# EAGLE board control (EAGLE 9.6.2), part 1 of 2
VERSION: v3.4
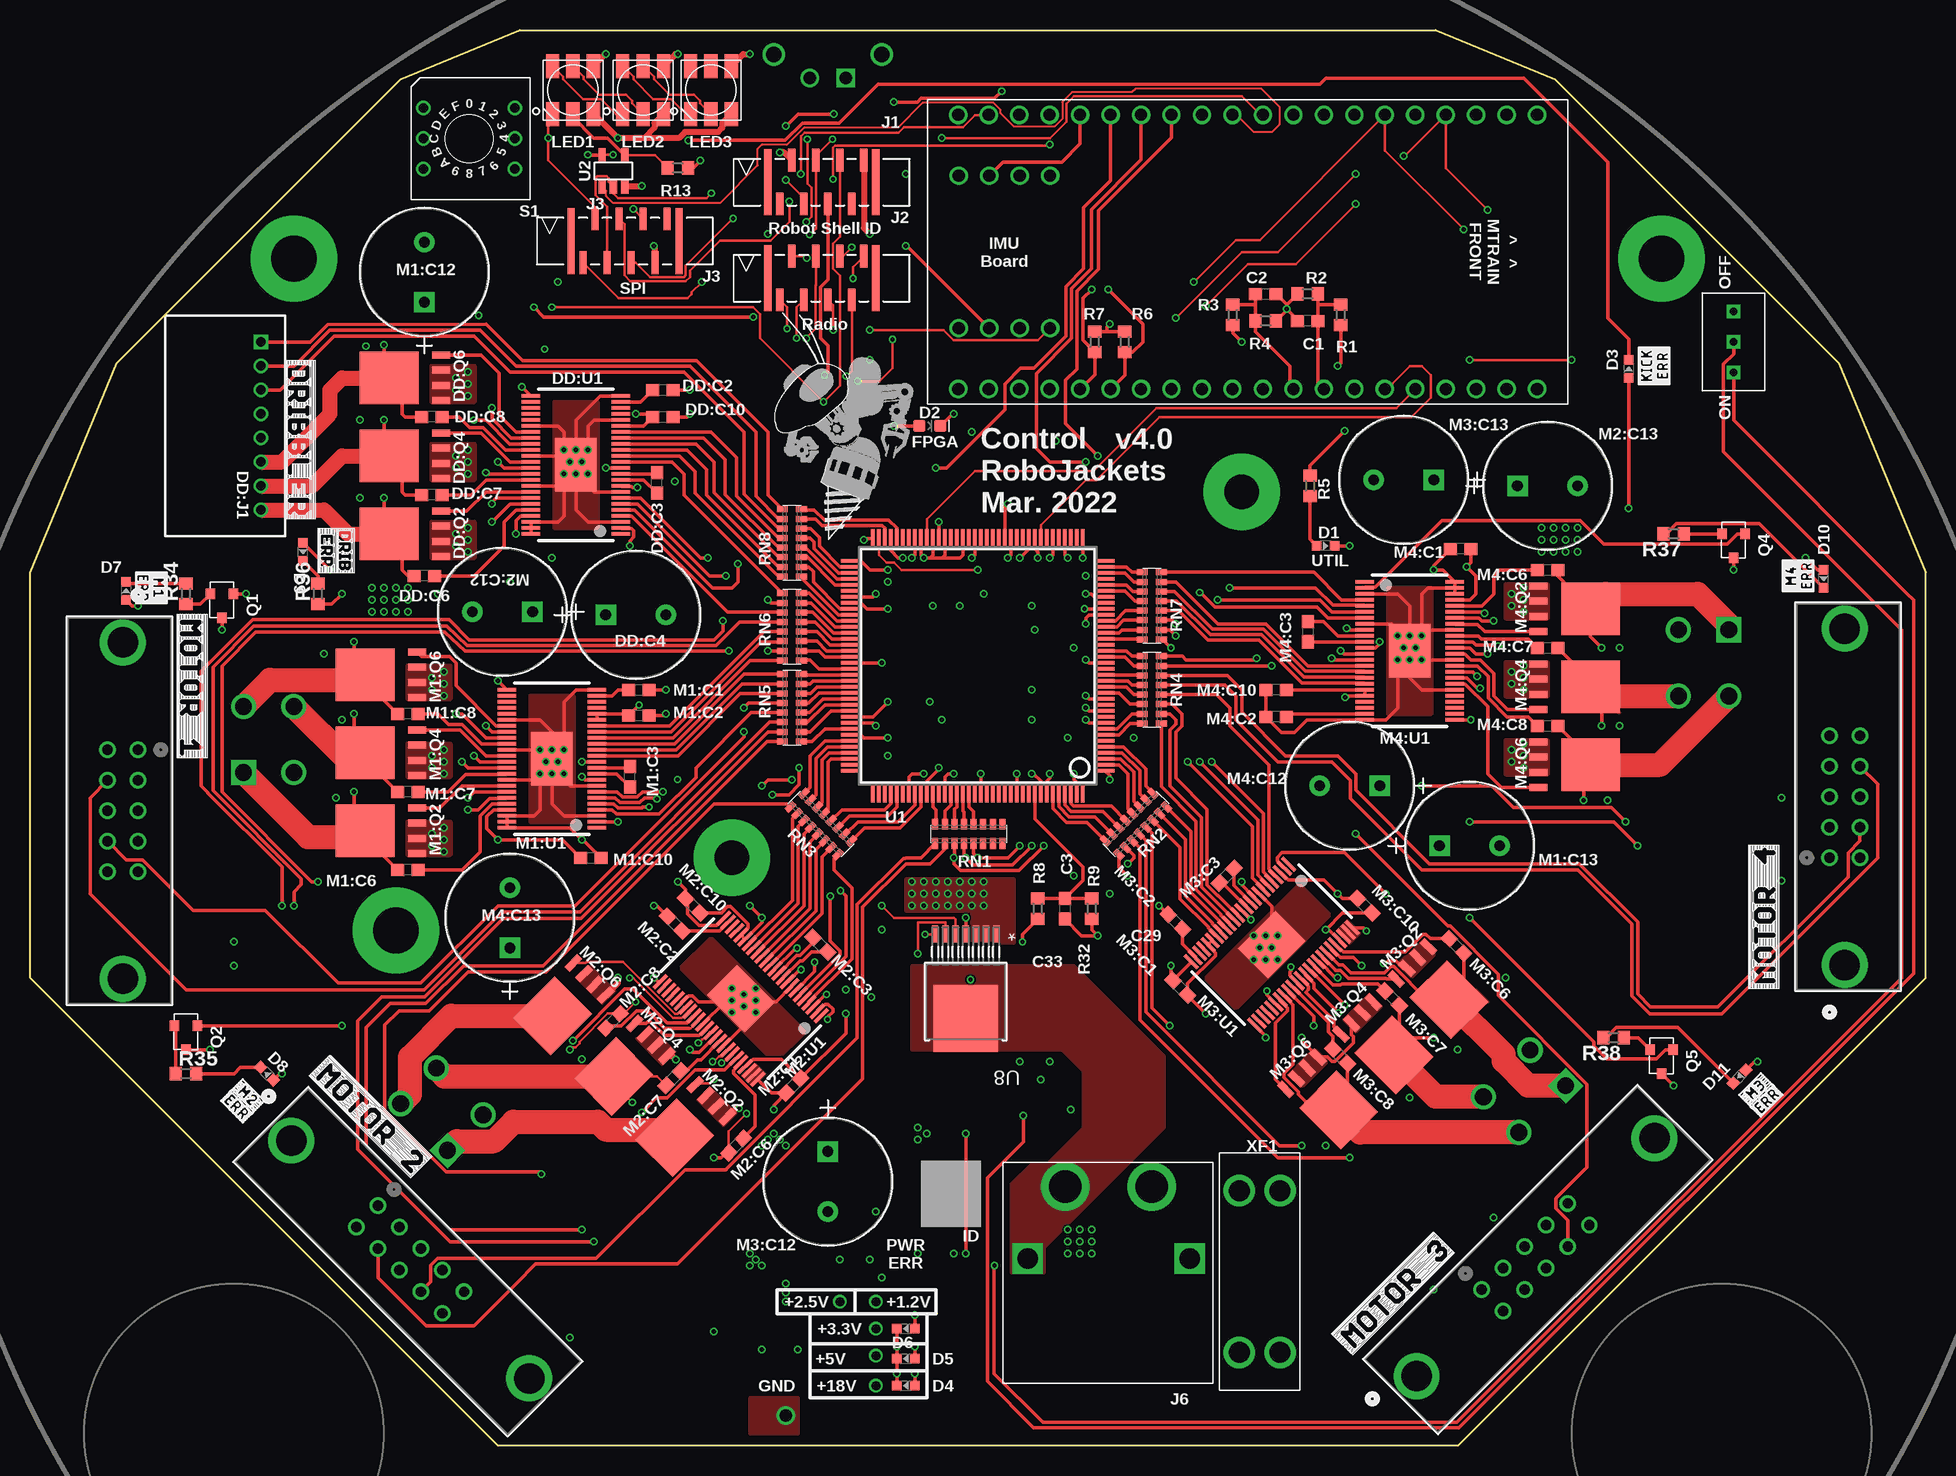
[diagram p0: board, top side]
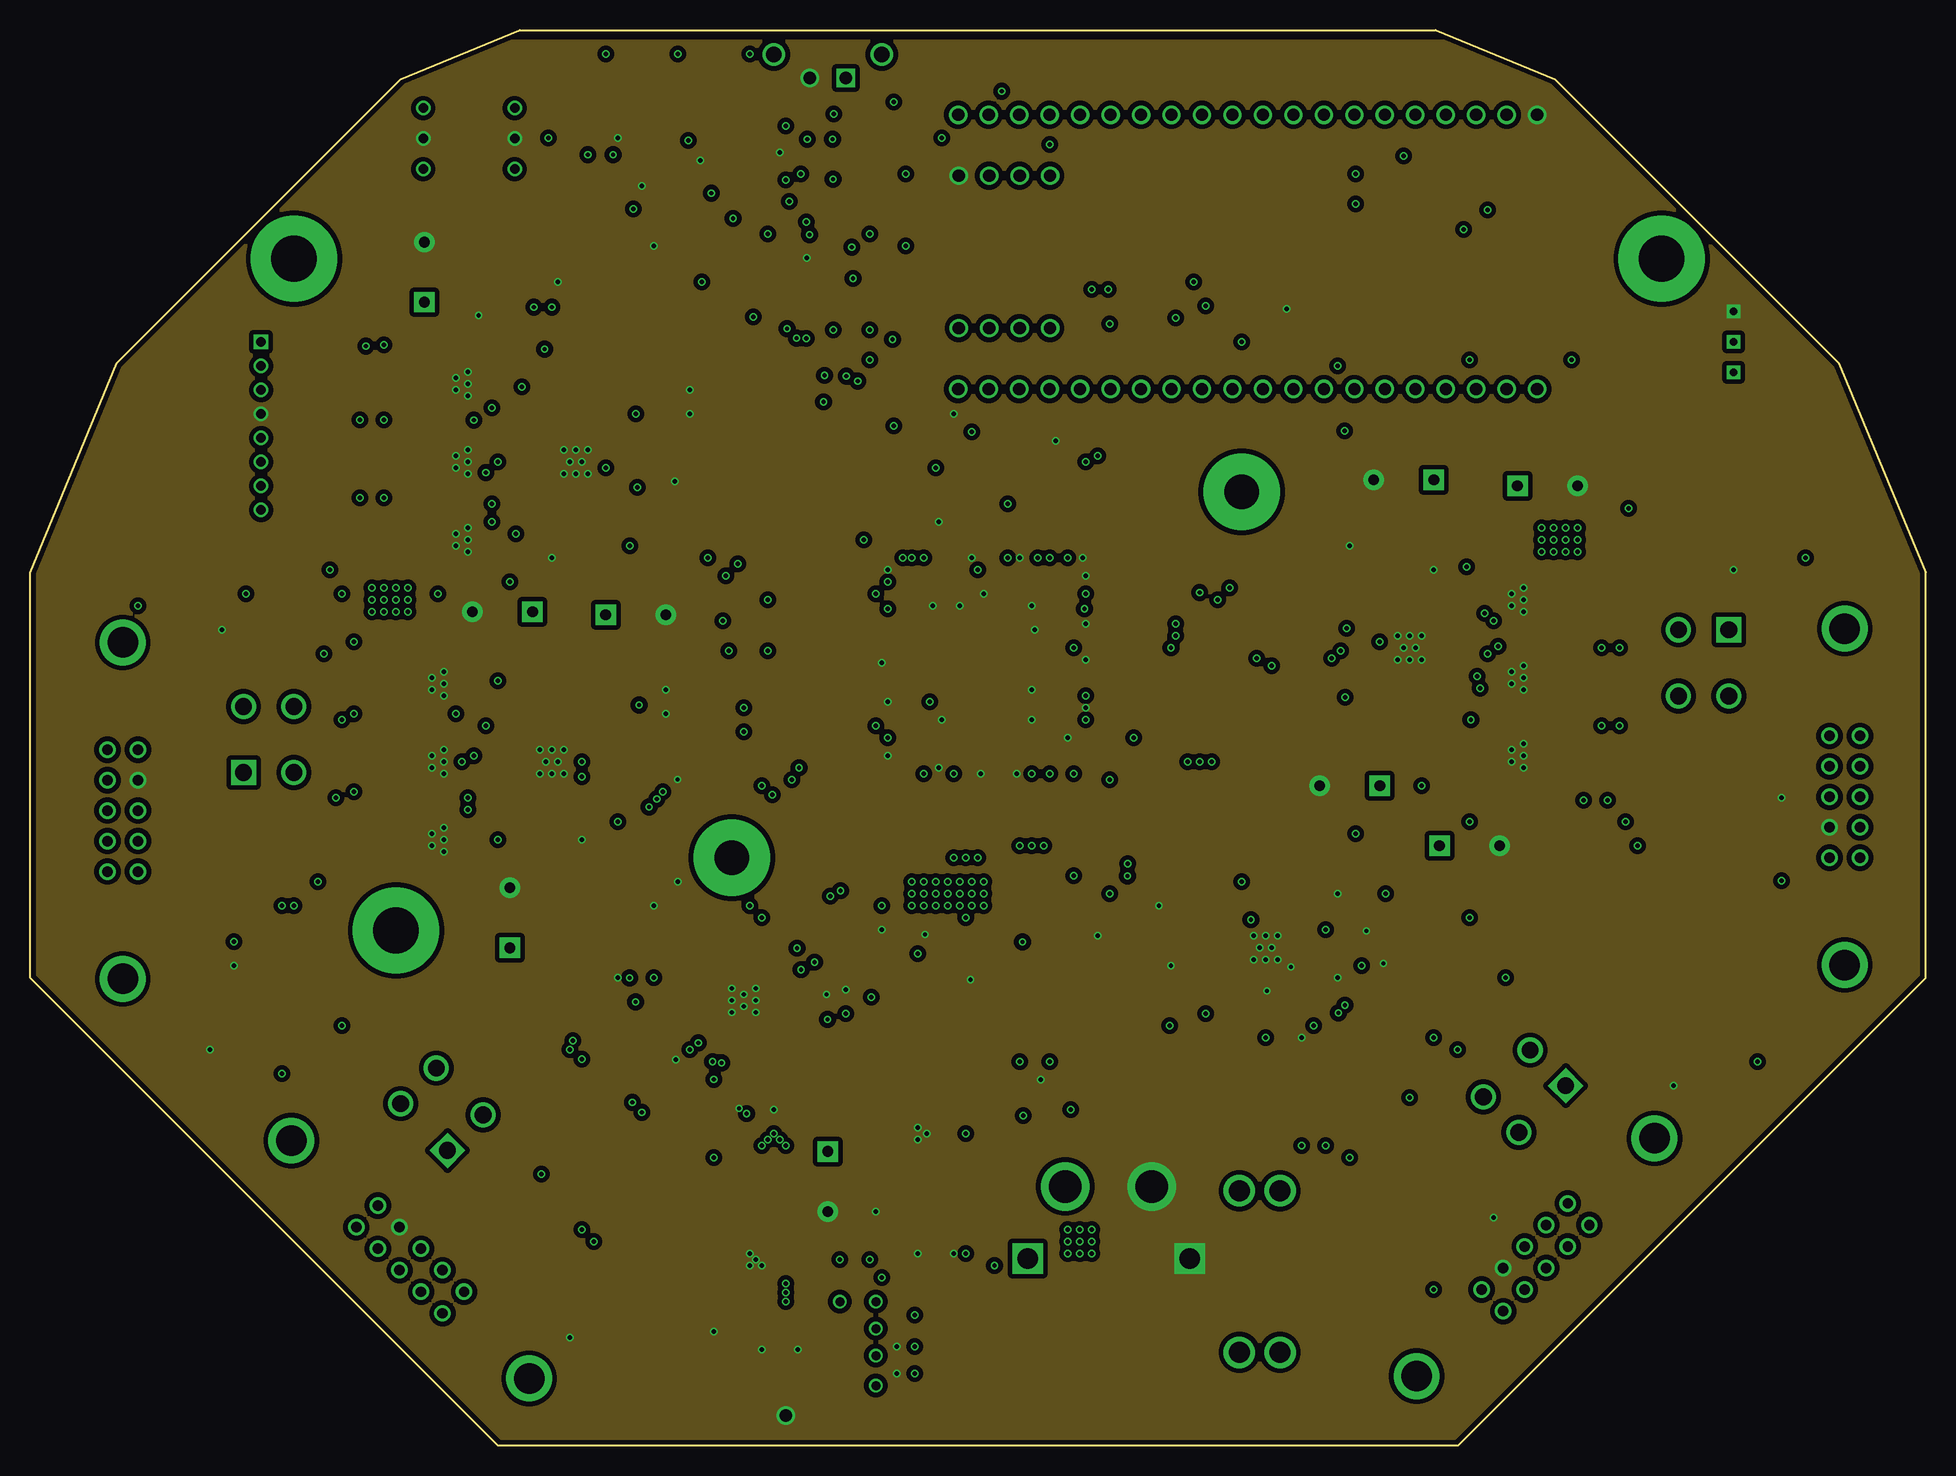
[diagram p1: board, inner layer GND]
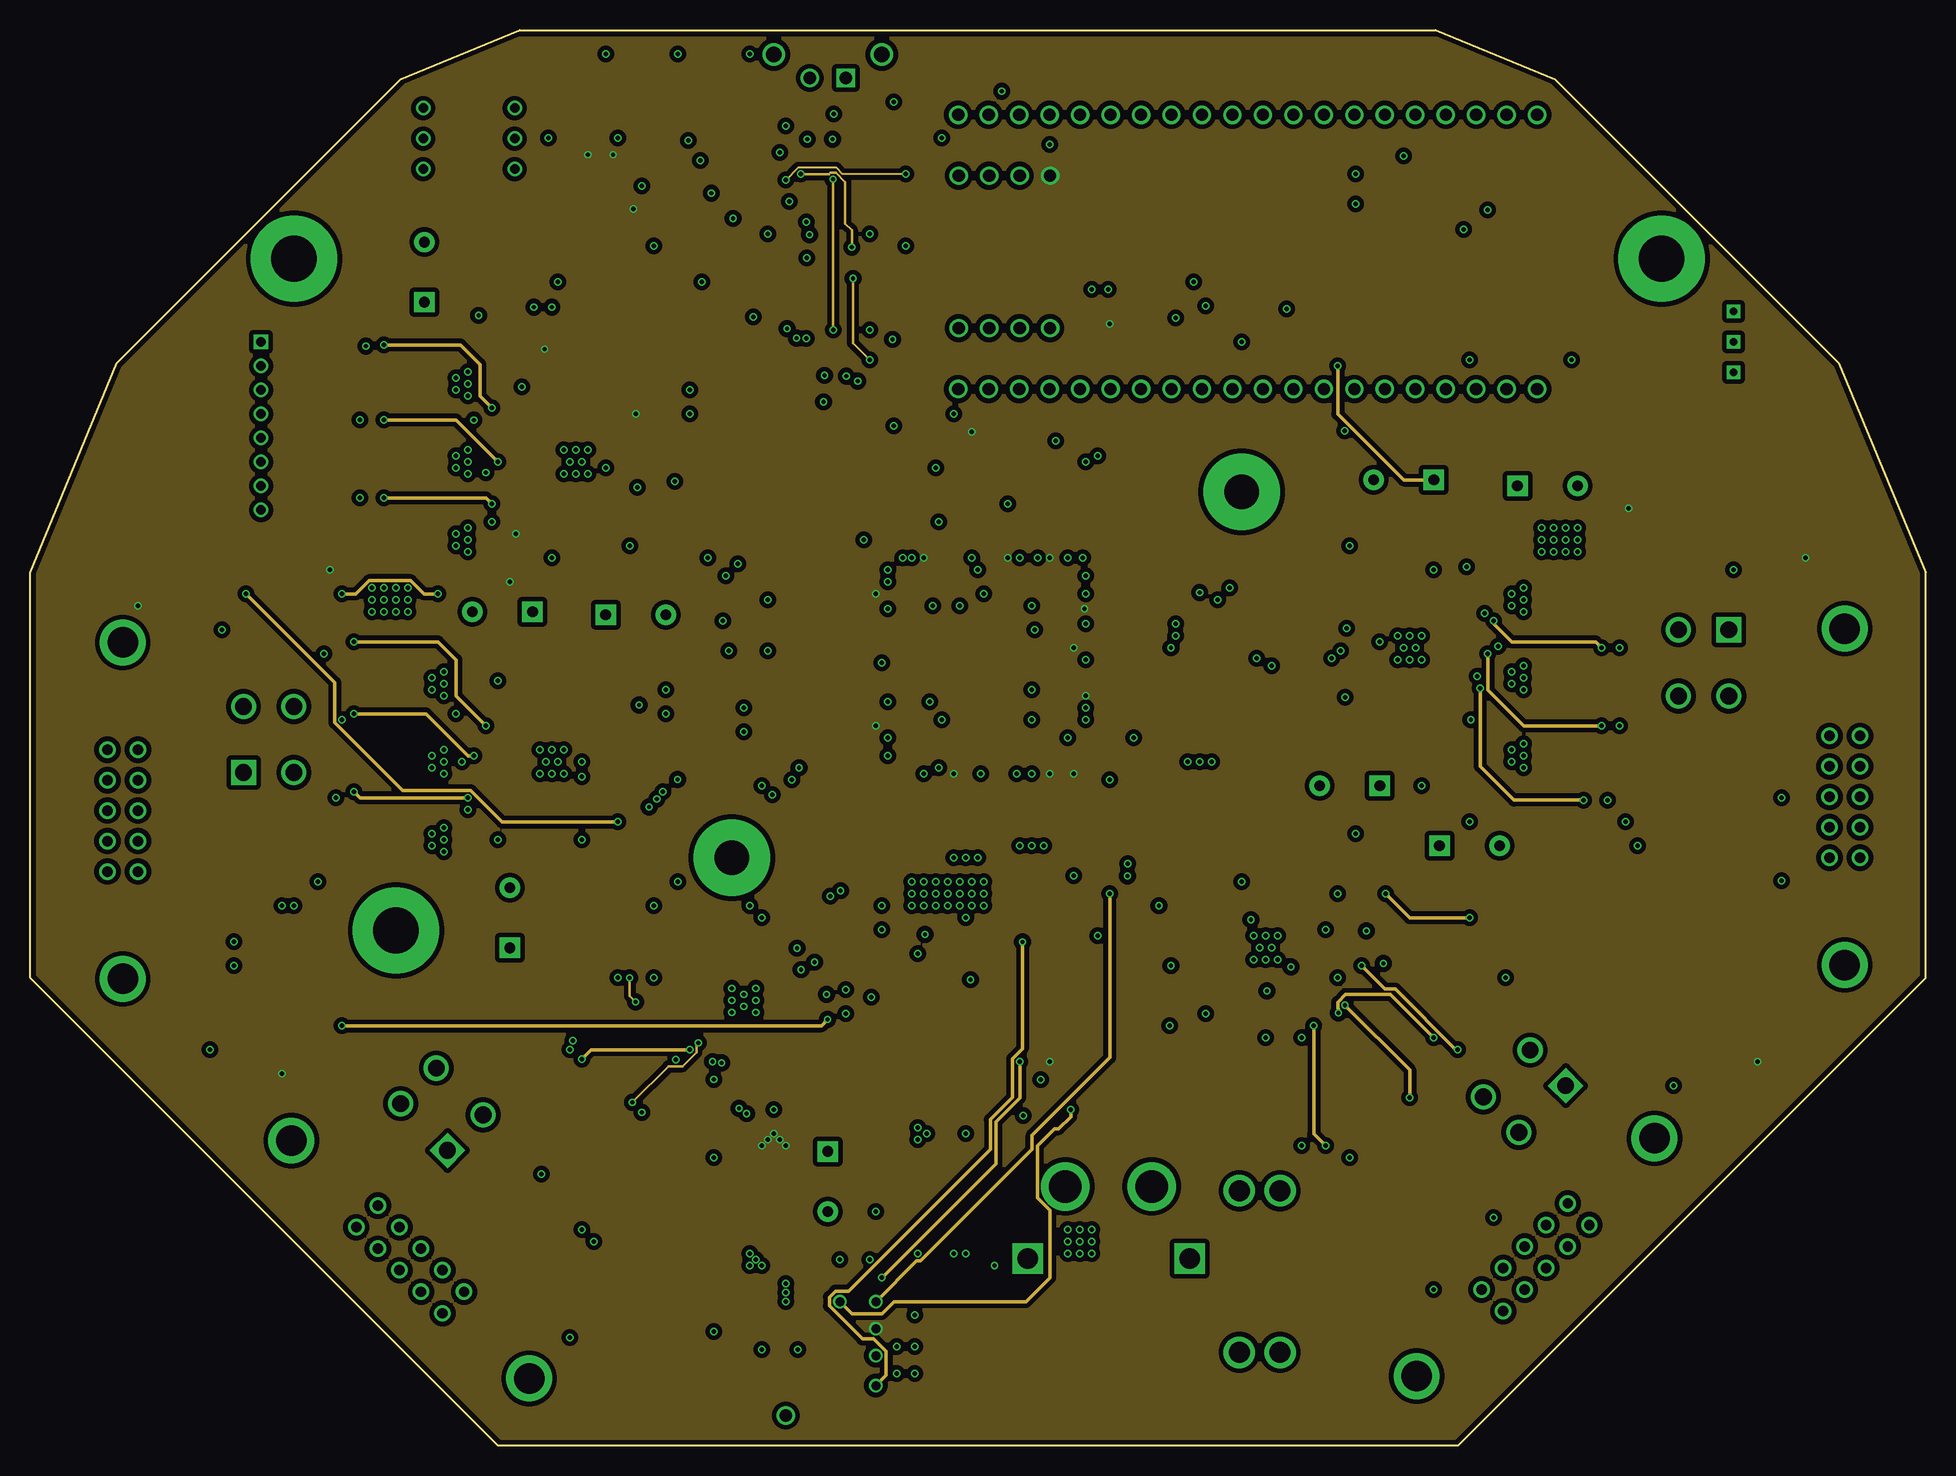
[diagram p2: board, inner layer 3v3]
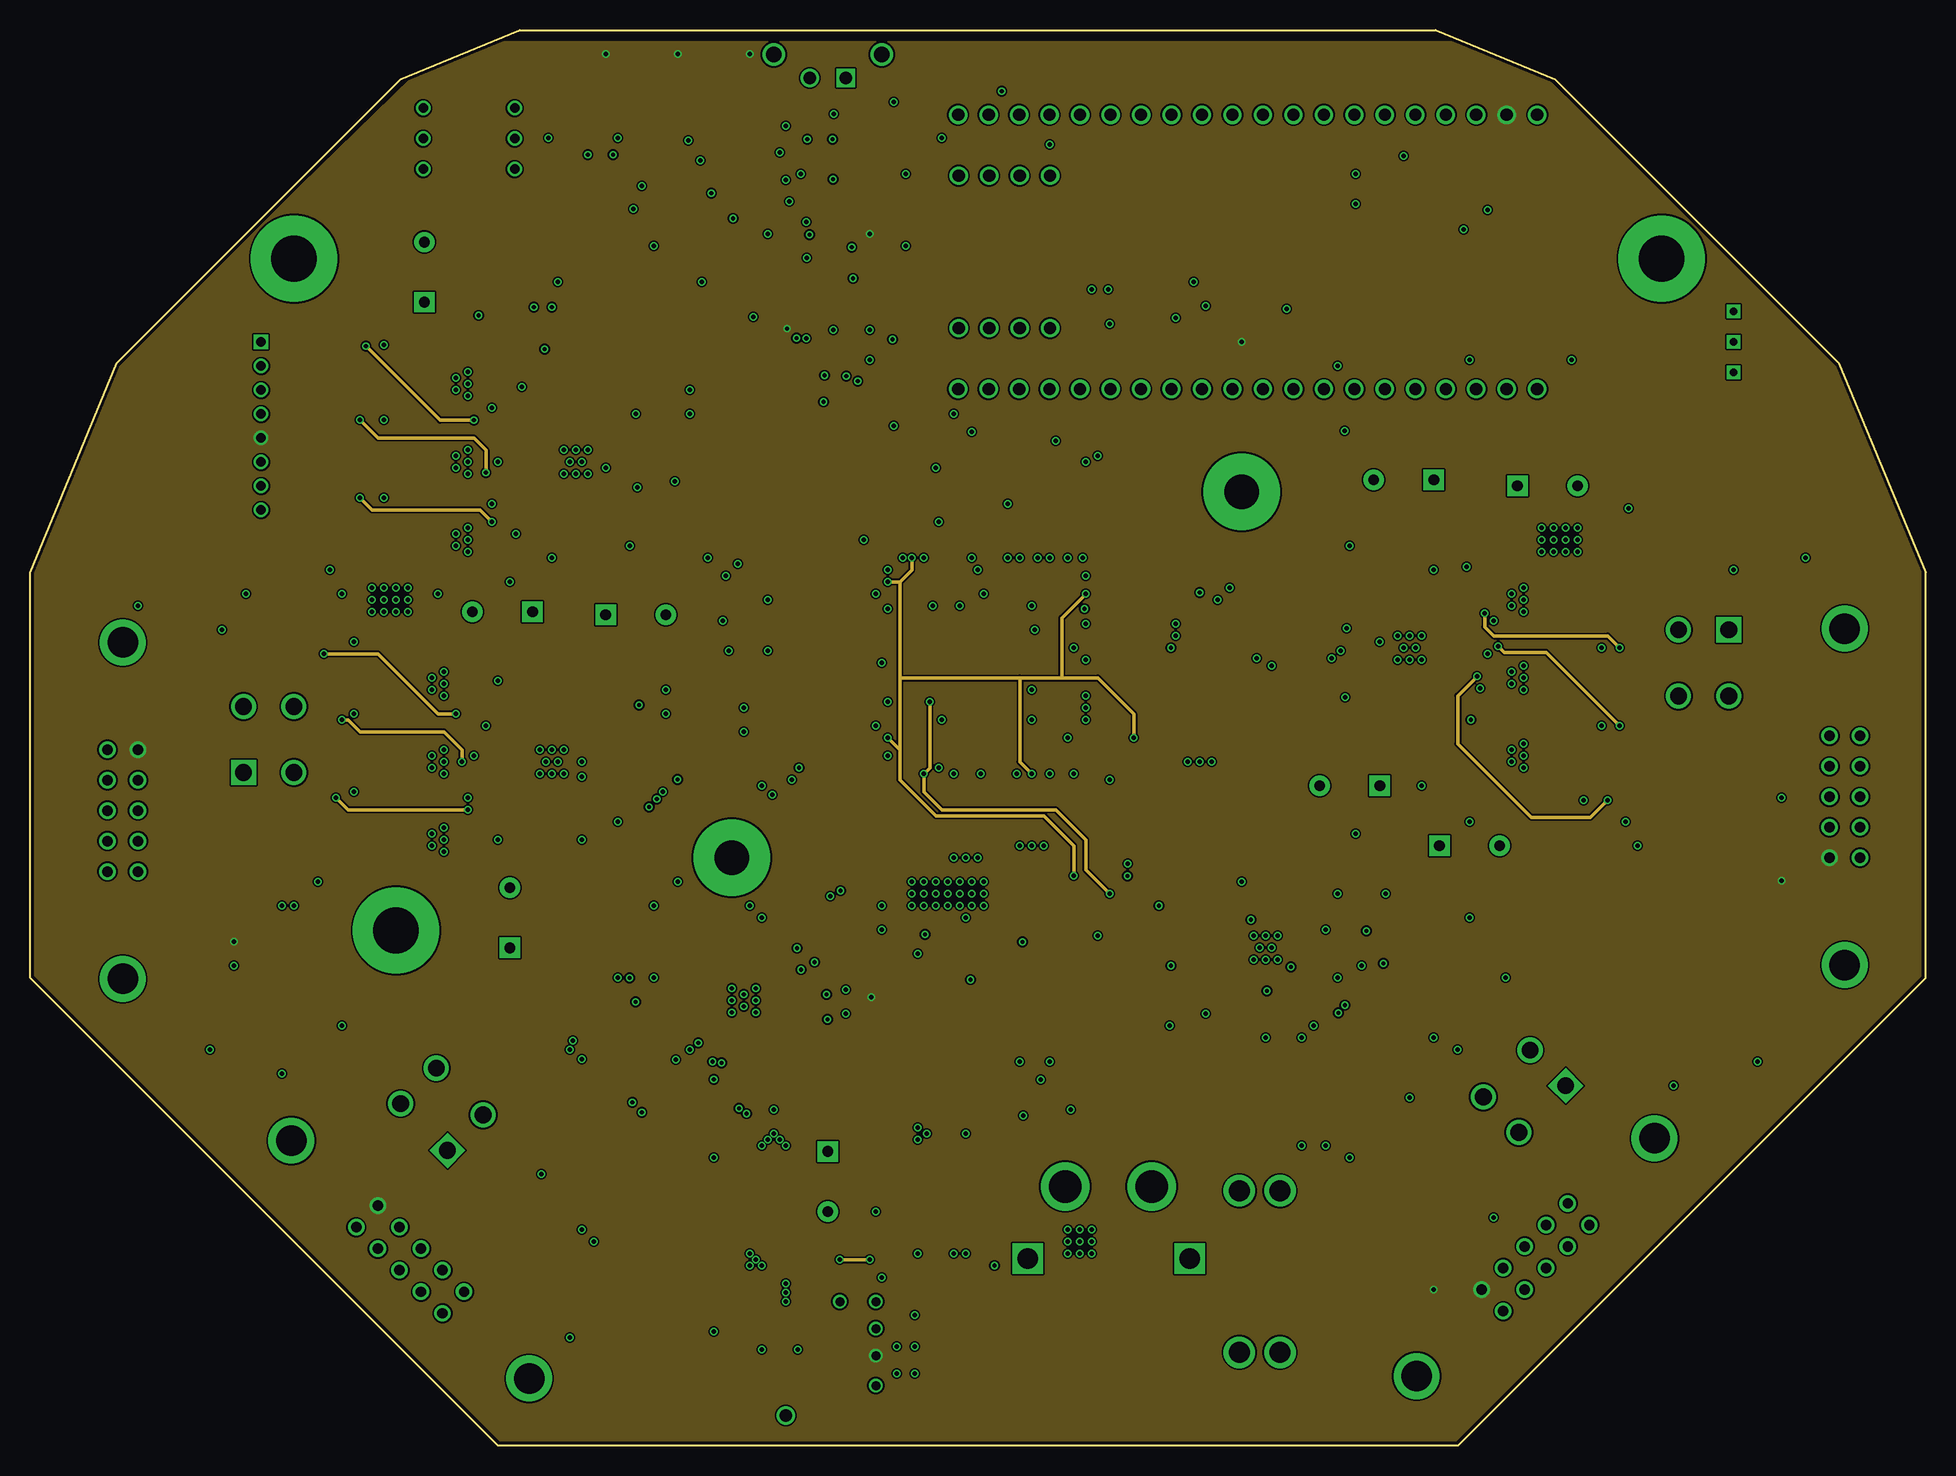
[diagram p3: board, inner layer 5v]
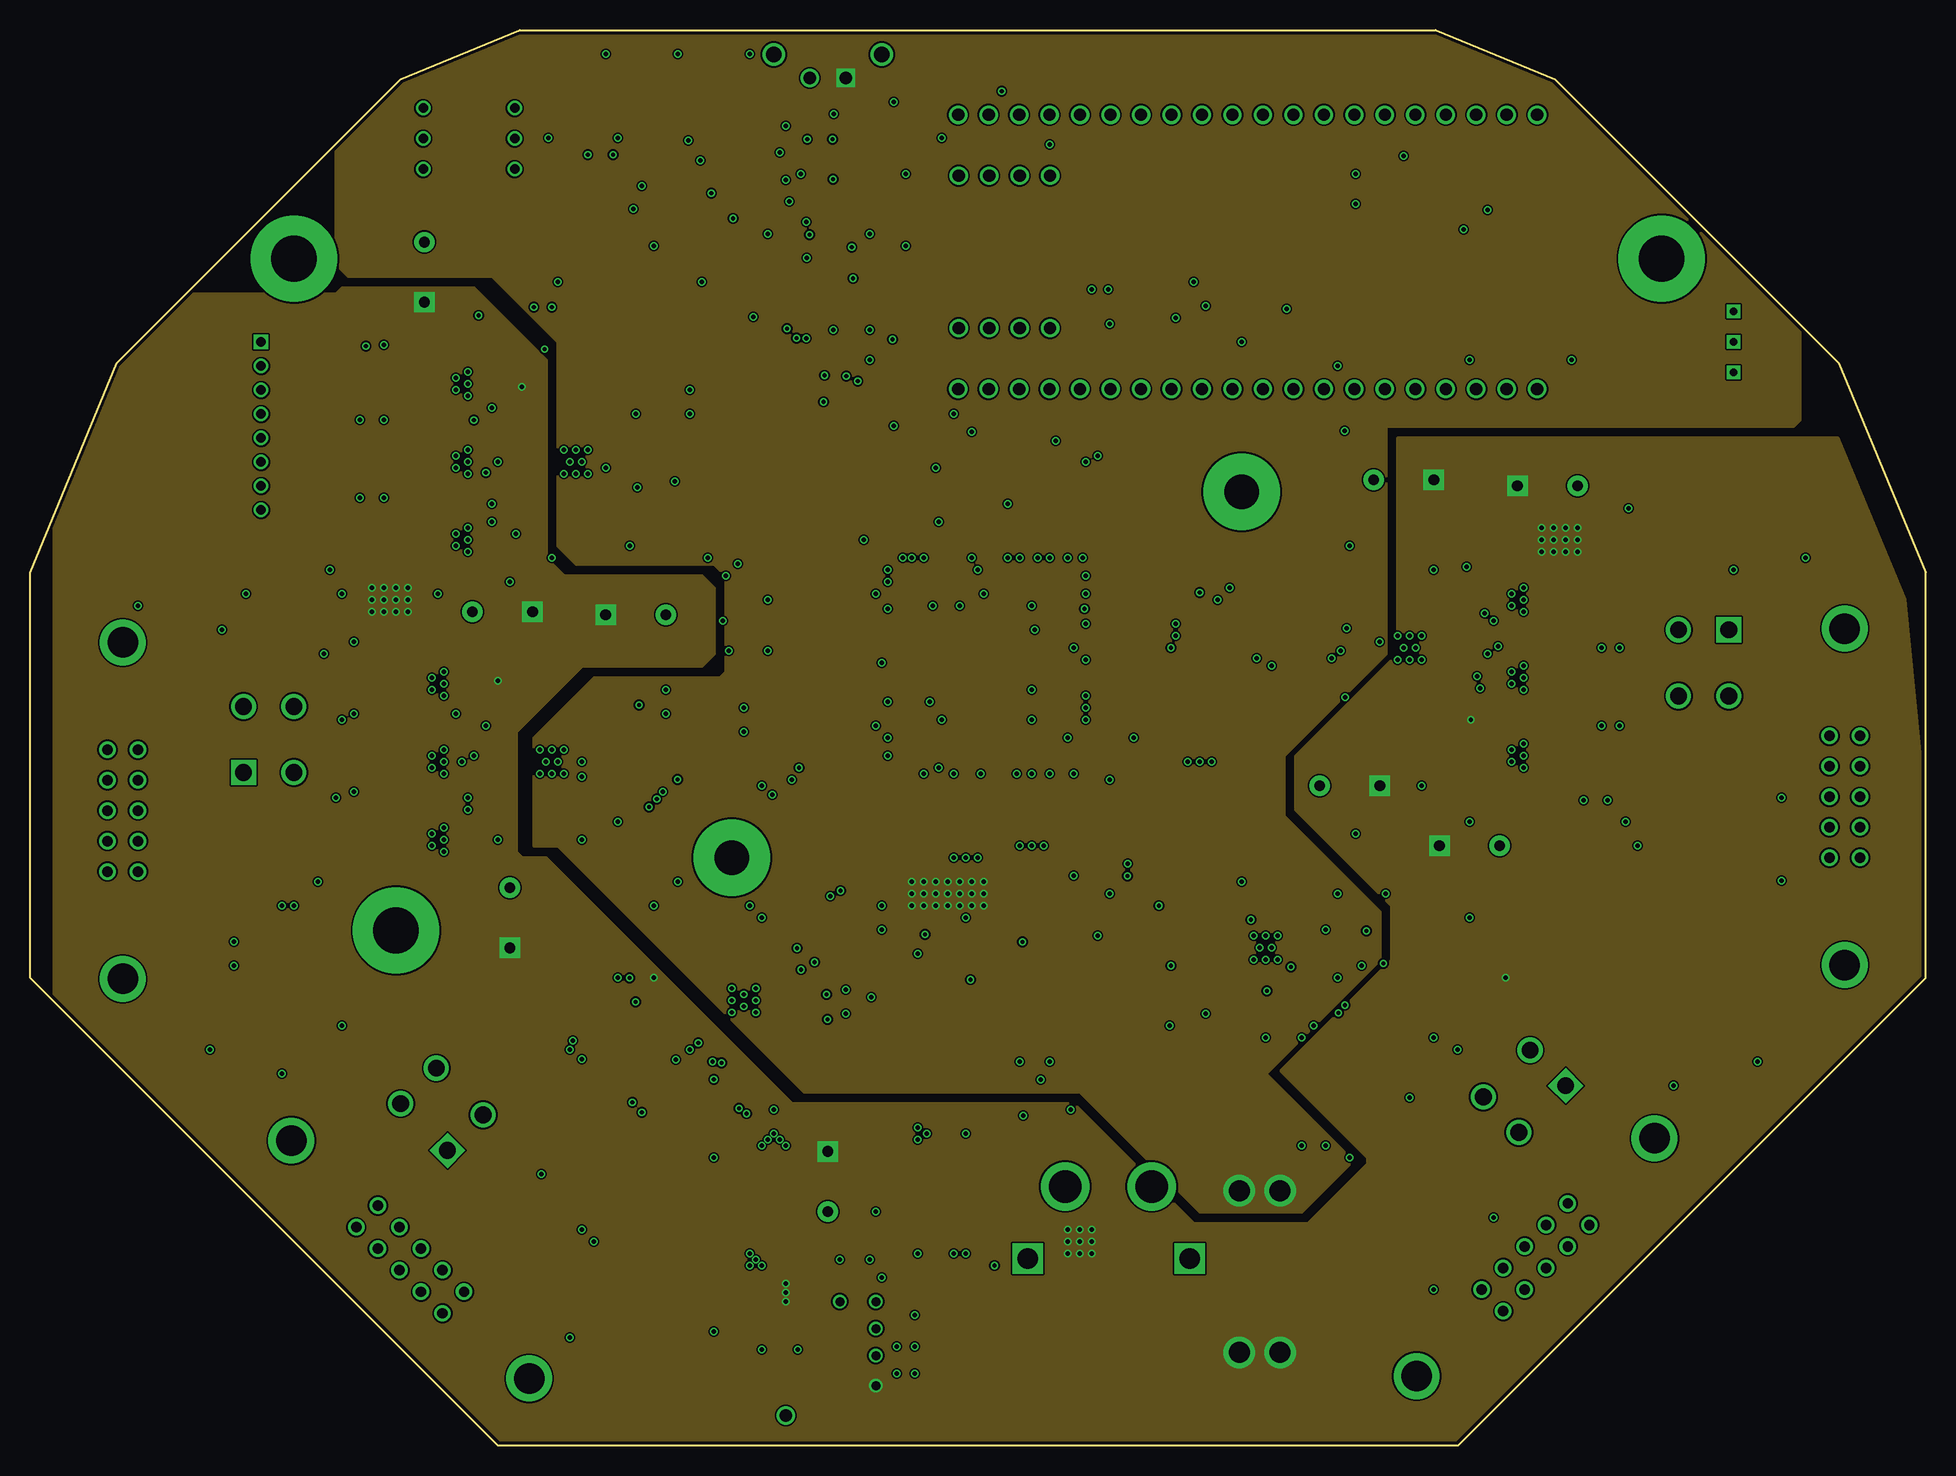
[diagram p4: board, inner layer Vbatt]
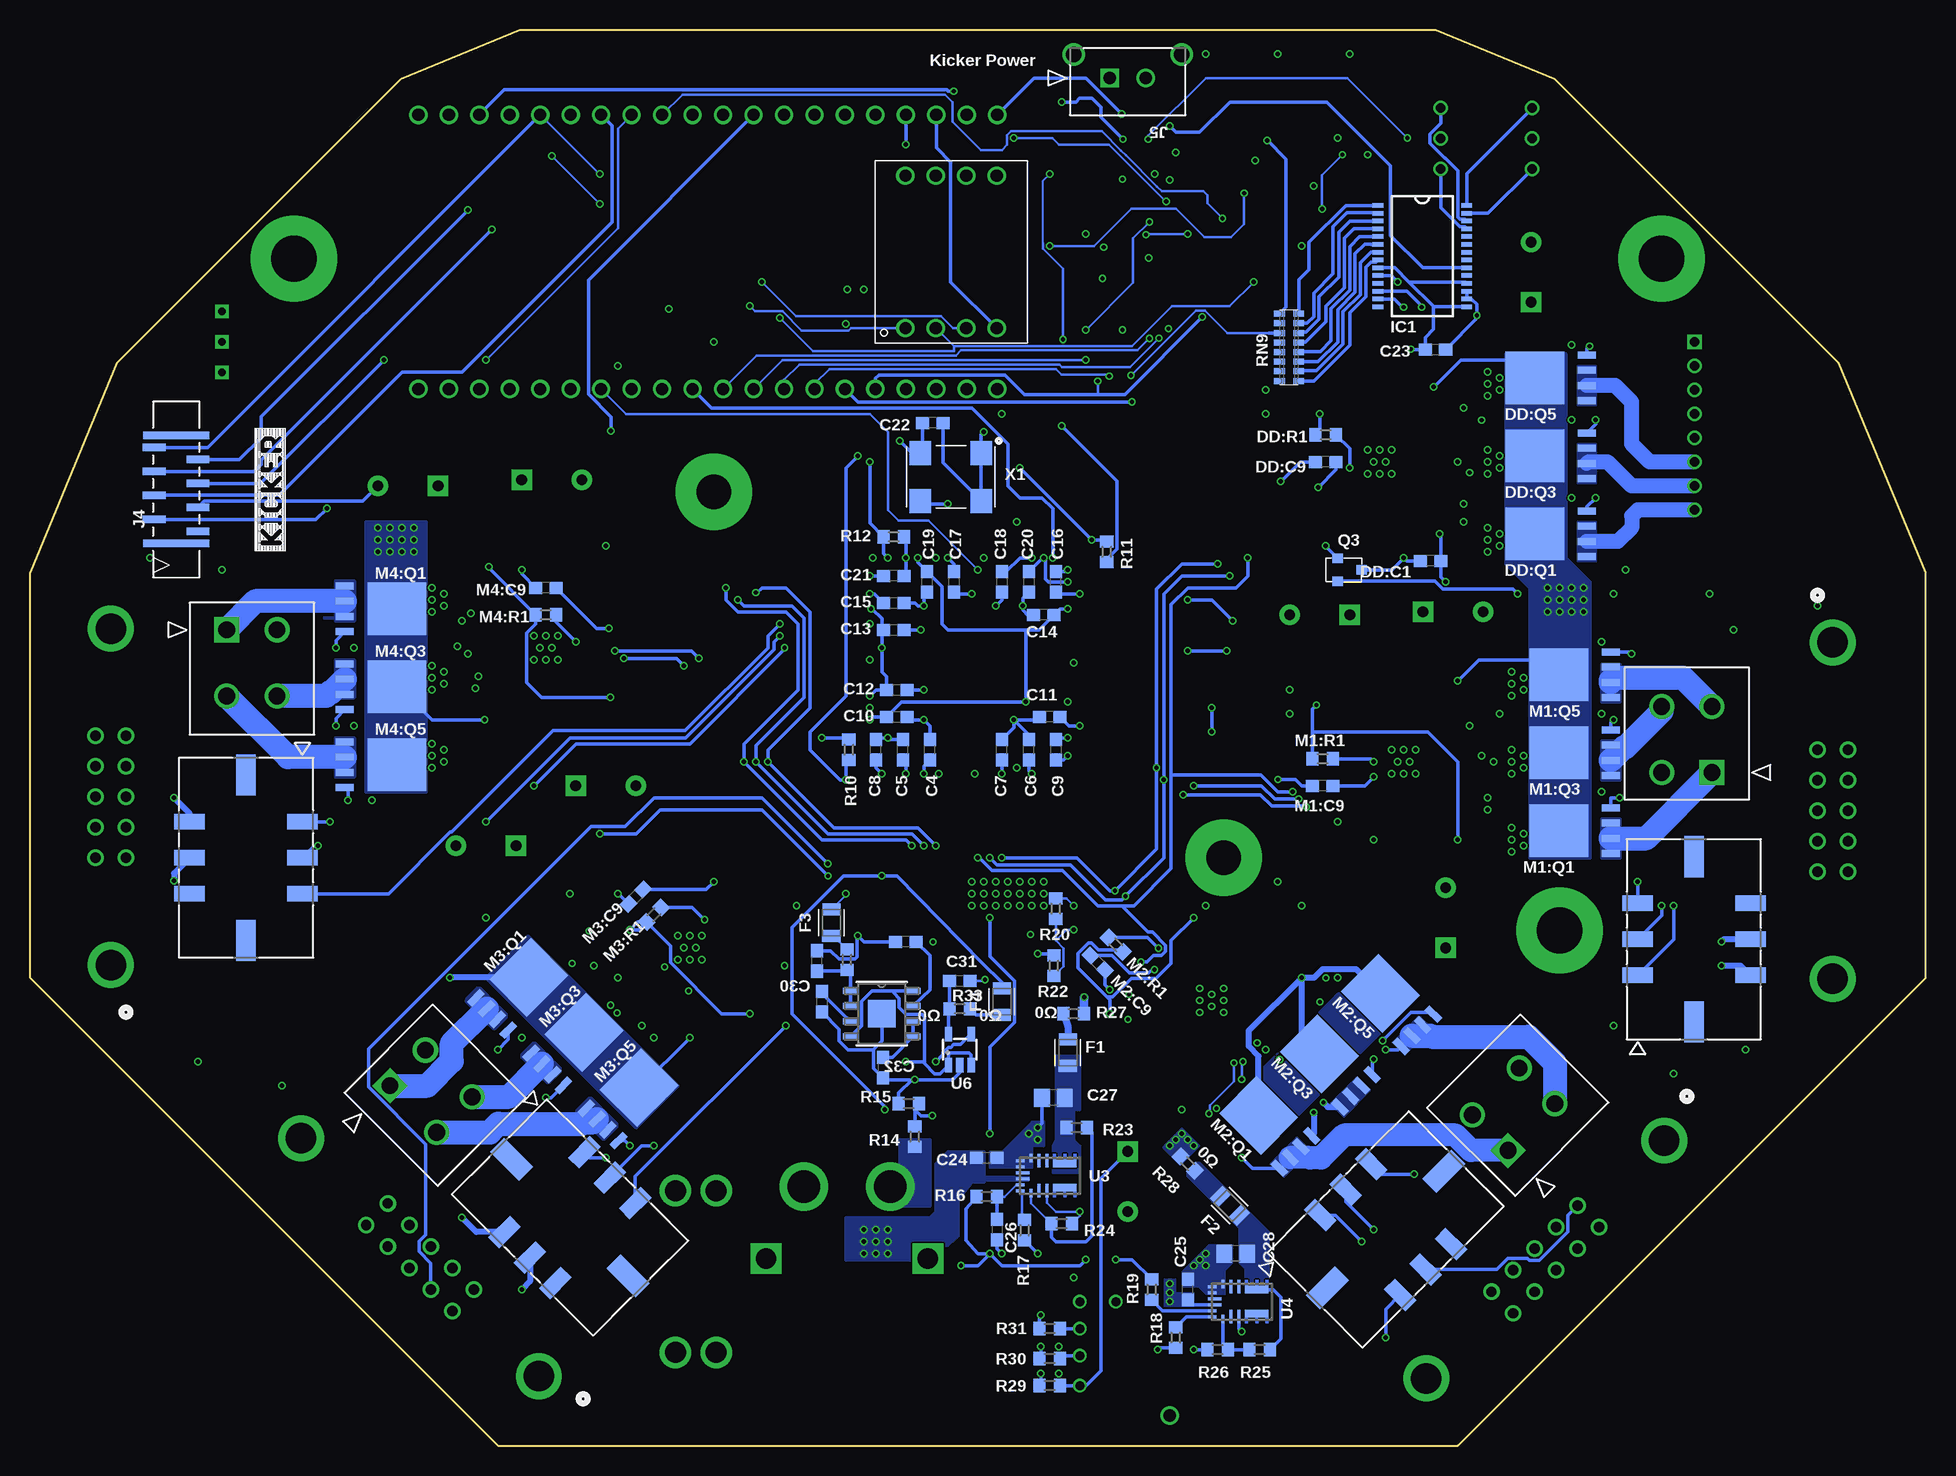
[diagram p5: board, bottom side, seen from below]

Size 158 x 118 mm. Coordinates in mm from the lower left corner, seen from the top.
Outline: 7.24,90.24 30.88,113.88 40.83,118 117.17,118 127.12,113.88 150.76,90.24 158,72.76 158,39 119,0 39,0 0,39 0,72.76 7.24,90.24
Copper layers (1+2*3+14*15+16): Top 0.018mm / dielectric 0.2mm / GND 0.035mm / dielectric 0.36mm / 3v3 0.035mm / dielectric 0.3mm / 5v 0.035mm / dielectric 0.15mm / Vbatt 0.035mm / dielectric 0.2mm / Bottom 0.018mm
Design rules "eC_6Layer_PClass6_BaseCopperO18-I35_eCDefault *": minimum track width 0.15mm, minimum drill 0.35mm, track to track 0.15mm, track to pad 0.15mm, pad to pad 0.15mm, via to via 0.15mm, smd to smd 0mil, copper to edge 0.25mm, drill to drill 0.35mm, minimum pad ring 0.175mm, minimum via ring 0.125mm, stop-mask expansion 0mil, vias tented up to drill 0.45mm, thermal gap 0.2mm

## Footprints (pad centres in the part's own frame; a part is rotated, then mirrored left to right if it is on the bottom)
C0603 = smd 1.1 x 1: 1 -0.85,0; 2 0.85,0
C0805 = smd 1.3 x 1.5: 1 -0.95,0; 2 0.95,0
CHIP-LED0603 = smd 0.8 x 0.8: A 0,-0.75; C 0,0.75
LED-0603 = smd 1 x 1: A -0.877,0; C 0.877,0
CAP_PAN_10X12.5 = drill 0.914 pad 1.676 square: 1 -5.004,0 | drill 0.914 pad 1.676: 2 0,0
2MM-8-H = drill 0.8 square: 1 -7,0 | drill 0.8: 2 -5,0; 3 -3,0; 4 -1,0; 5 1,0; 6 3,0; 7 5,0; 8 7,0
PQFN_5X6_E = smd 1.5 x 0.6: 1 -3.02,1.905; 2 -3.02,0.635; 3 -3.02,-0.635; 4 -3.02,-1.905 | smd 4.895 x 4.41: 5678 1.323,0
R0603 = smd 1 x 1.1: 1 -0.85,0; 2 0.85,0
TSSOP-48_PAD = smd 0.3 x 1.55: 1 -5.75,-3.75; 2 -5.25,-3.75; 3 -4.75,-3.75; 4 -4.25,-3.75; 5 -3.75,-3.75; 6 -3.25,-3.75; 7 -2.75,-3.75; 8 -2.25,-3.75; 9 -1.75,-3.75; 10 -1.25,-3.75; 11 -0.75,-3.75; 12 -0.25,-3.75; 13 0.25,-3.75; 14 0.75,-3.75; 15 1.25,-3.75; 16 1.75,-3.75; 17 2.25,-3.75; 18 2.75,-3.75; 19 3.25,-3.75; 20 3.75,-3.75; 21 4.25,-3.75; 22 4.75,-3.75; 23 5.25,-3.75; 24 5.75,-3.75; 25 5.75,3.75; 26 5.25,3.75; 27 4.75,3.75; 28 4.25,3.75; 29 3.75,3.75; 30 3.25,3.75; 31 2.75,3.75; 32 2.25,3.75; 33 1.75,3.75; 34 1.25,3.75; 35 0.75,3.75; 36 0.25,3.75; 37 -0.25,3.75; 38 -0.75,3.75; 39 -1.25,3.75; 40 -1.75,3.75; 41 -2.25,3.75; 42 -2.75,3.75; 43 -3.25,3.75; 44 -3.75,3.75; 45 -4.25,3.75; 46 -4.75,3.75; 47 -5.25,3.75; 48 -5.75,3.75 | smd 4.42 x 3.483: PAD 0,0
FUSC2113X75 = smd 1 x 1.52: 1 -1.1,0 | smd 1 x 1.5: 2 1.1,0
SSOP-28 = smd 0.9 x 0.38: 1 -3.7,4.225; 2 -3.7,3.575; 3 -3.7,2.925; 4 -3.7,2.275; 5 -3.7,1.625; 6 -3.7,0.975; 7 -3.7,0.325; 8 -3.7,-0.325; 9 -3.7,-0.975; 10 -3.7,-1.625; 11 -3.7,-2.275; 12 -3.7,-2.925; 13 -3.7,-3.575; 14 -3.7,-4.225; 15 3.7,-4.225; 16 3.7,-3.575; 17 3.7,-2.925; 18 3.7,-2.275; 19 3.7,-1.625; 20 3.7,-0.975; 21 3.7,-0.325; 22 3.7,0.325; 23 3.7,0.975; 24 3.7,1.625; 25 3.7,2.275; 26 3.7,2.925; 27 3.7,3.575; 28 3.7,4.225
CON8_1X8_UB_SFW_JAE = smd 0.61 x 1.905: 1 0,0; 2 1,3.65; 3 2,0; 4 3,3.65; 5 4,0; 6 5,3.65; 7 6,0; 8 7,3.65 | smd 0.61 x 5.512: NC1 -1,1.803; NC2 8,1.803
CON_436500217_MOL = drill 1.016 pad 1.524 square: 1 0,0 | drill 1.016 pad 1.524: 2 -2.997,0 | drill 1.27 pad 1.27: M1 2.997,-1.956; M2 -5.994,-1.956
XT60PW-M = drill 2.7: P$1 -3.6,0; P$2 3.6,0 | drill 1.7 square: P$3 -6.75,6; P$4 6.75,6
MTRAIN-KIT = drill 1.02: !RST 11.43,16.51; GND -11.43,24.13; NC 11.43,19.05; P$3 -11.43,19.05; P$4 -11.43,16.51; P$5 -11.43,13.97; P$6 -11.43,11.43; P$7 -11.43,8.89; P$8 -11.43,6.35; P$9 -11.43,3.81; P$10 -11.43,1.27; P$11 -11.43,-1.27; P$12 -11.43,-3.81; P$13 -11.43,-6.35; P$14 -11.43,-8.89; P$15 -11.43,-11.43; P$16 -11.43,-13.97; P$17 -11.43,-16.51; P$18 -11.43,-19.05; P$19 -11.43,-21.59; P$20 -11.43,-24.13; P$25 11.43,-13.97; P$26 11.43,-11.43; P$27 11.43,-8.89; P$28 11.43,-6.35; P$29 11.43,-3.81; P$30 11.43,-1.27; P$31 11.43,1.27; P$32 11.43,3.81; P$33 11.43,6.35; P$34 11.43,8.89; P$35 11.43,11.43; P$36 11.43,13.97; RX+ 11.43,-16.51; RX- 11.43,-19.05; TX+ 11.43,-21.59; TX- 11.43,-24.13; VBUS 11.43,21.59; VDD 11.43,24.13; VIN -11.43,21.59
IMU = drill 1.016: 1 -6.35,3.81; 2 -6.35,1.27; 3 -6.35,-1.27; 4 -6.35,-3.81; 5 6.35,-3.81; 6 6.35,-1.27; 7 6.35,1.27; 8 6.35,3.81
APA102_5050 = smd 2 x 1.1: 1 2,-1.7; 2 2,0; 3 2,1.7; 4 -2,1.7; 5 -2,0; 6 -2,-1.7
CON_430450618_MOL = smd 1.27 x 2.54: 1 3,-4.7; 2 0,-4.7; 3 -3,-4.7; 4 3,4.7; 5 0,4.7; 6 -3,4.7 | smd 3.43 x 1.65: S1 6.885,0; S2 -6.885,0
CON_39288040 = drill 1.397 pad 1.905 square: 1 0,0 | drill 1.397 pad 1.905: 2 4.191,0; 3 0,-5.512; 4 4.191,-5.512
N3793-6303RB_3MM = drill 0.864 pad 1.372: 1 10.16,0; 2 10.16,-2.54; 3 7.62,0; 4 7.62,-2.54; 5 5.08,0; 6 5.08,-2.54; 7 2.54,0; 8 2.54,-2.54; 9 0,0; 10 0,-2.54 | drill 2.54 pad 3.048: 11 -8.941,-1.27; 12 19.101,-1.27
SOT-23 = smd 0.8 x 0.9: 1 -0.95,0; 2 0.95,0; 3 0,2
RA-8_2506 = smd 0.5 x 0.9: 1 -2.8,-0.8; 2 -2,-0.8; 3 -1.2,-0.8; 4 -0.4,-0.8; 5 0.4,-0.8; 6 1.2,-0.8; 7 2,-0.8; 8 2.8,-0.8; 9 2.8,0.8; 10 2,0.8; 11 1.2,0.8; 12 0.4,0.8; 13 -0.4,0.8; 14 -1.2,0.8; 15 -2,0.8; 16 -2.8,0.8
HEX = drill 0.8: 1 -2.54,-3.81; 2 2.54,3.81; 4 2.54,-3.81; 8 -2.54,3.81; C1 0,-3.81; C2 0,3.81
TT11EGPC1 = drill 0.6 pad 1.09 square: 1 -2.54,0; 2 2.54,0; 3 0,0
TQFP144 = smd 0.3 x 1.6: 1 -8.75,-10.6; 2 -8.25,-10.6; 3 -7.75,-10.6; 4 -7.25,-10.6; 5 -6.75,-10.6; 6 -6.25,-10.6; 7 -5.75,-10.6; 8 -5.25,-10.6; 9 -4.75,-10.6; 10 -4.25,-10.6; 11 -3.75,-10.6; 12 -3.25,-10.6; 13 -2.75,-10.6; 14 -2.25,-10.6; 15 -1.75,-10.6; 16 -1.25,-10.6; 17 -0.75,-10.6; 18 -0.25,-10.6; 19 0.25,-10.6; 20 0.75,-10.6; 21 1.25,-10.6; 22 1.75,-10.6; 23 2.25,-10.6; 24 2.75,-10.6; 25 3.25,-10.6; 26 3.75,-10.6; 27 4.25,-10.6; 28 4.75,-10.6; 29 5.25,-10.6; 30 5.75,-10.6; 31 6.25,-10.6; 32 6.75,-10.6; 33 7.25,-10.6; 34 7.75,-10.6; 35 8.25,-10.6; 36 8.75,-10.6; 73 8.75,10.6; 74 8.25,10.6; 75 7.75,10.6; 76 7.25,10.6; 77 6.75,10.6; 78 6.25,10.6; 79 5.75,10.6; 80 5.25,10.6; 81 4.75,10.6; 82 4.25,10.6; 83 3.75,10.6; 84 3.25,10.6; 85 2.75,10.6; 86 2.25,10.6; 87 1.75,10.6; 88 1.25,10.6; 89 0.75,10.6; 90 0.25,10.6; 91 -0.25,10.6; 92 -0.75,10.6; 93 -1.25,10.6; 94 -1.75,10.6; 95 -2.25,10.6; 96 -2.75,10.6; 97 -3.25,10.6; 98 -3.75,10.6; 99 -4.25,10.6; 100 -4.75,10.6; 101 -5.25,10.6; 102 -5.75,10.6; 103 -6.25,10.6; 104 -6.75,10.6; 105 -7.25,10.6; 106 -7.75,10.6; 107 -8.25,10.6; 108 -8.75,10.6 | smd 1.6 x 0.3: 37 10.6,-8.75; 38 10.6,-8.25; 39 10.6,-7.75; 40 10.6,-7.25; 41 10.6,-6.75; 42 10.6,-6.25; 43 10.6,-5.75; 44 10.6,-5.25; 45 10.6,-4.75; 46 10.6,-4.25; 47 10.6,-3.75; 48 10.6,-3.25; 49 10.6,-2.75; 50 10.6,-2.25; 51 10.6,-1.75; 52 10.6,-1.25; 53 10.6,-0.75; 54 10.6,-0.25; 55 10.6,0.25; 56 10.6,0.75; 57 10.6,1.25; 58 10.6,1.75; 59 10.6,2.25; 60 10.6,2.75; 61 10.6,3.25; 62 10.6,3.75; 63 10.6,4.25; 64 10.6,4.75; 65 10.6,5.25; 66 10.6,5.75; 67 10.6,6.25; 68 10.6,6.75; 69 10.6,7.25; 70 10.6,7.75; 71 10.6,8.25; 72 10.6,8.75; 109 -10.6,8.75; 110 -10.6,8.25; 111 -10.6,7.75; 112 -10.6,7.25; 113 -10.6,6.75; 114 -10.6,6.25; 115 -10.6,5.75; 116 -10.6,5.25; 117 -10.6,4.75; 118 -10.6,4.25; 119 -10.6,3.75; 120 -10.6,3.25; 121 -10.6,2.75; 122 -10.6,2.25; 123 -10.6,1.75; 124 -10.6,1.25; 125 -10.6,0.75; 126 -10.6,0.25; 127 -10.6,-0.25; 128 -10.6,-0.75; 129 -10.6,-1.25; 130 -10.6,-1.75; 131 -10.6,-2.25; 132 -10.6,-2.75; 133 -10.6,-3.25; 134 -10.6,-3.75; 135 -10.6,-4.25; 136 -10.6,-4.75; 137 -10.6,-5.25; 138 -10.6,-5.75; 139 -10.6,-6.25; 140 -10.6,-6.75; 141 -10.6,-7.25; 142 -10.6,-7.75; 143 -10.6,-8.25; 144 -10.6,-8.75
SOT-23-5 = smd 0.6 x 1.2: 1 -0.95,-1.306; 2 0,-1.306; 3 0.95,-1.306; 4 0.95,1.306; 5 -0.95,1.306
MPM3620GQV-P = smd 0.7 x 0.25: 1 -1.45,1.55; 12 1.45,1.55 | smd 1.1 x 0.25: 2 -1.25,0.9; 3 -1.25,0.25; 10 1.25,0.25; 11 1.25,0.9 | smd 0.25 x 0.7: 13 1.25,2.45; 14 0.75,2.45; 17 -0.75,2.45; 18 -1.25,2.45 | smd 0.25 x 1.1: 15 0.25,2.25; 16 -0.25,2.25 | smd 0.6 x 1.95: 456 -1,-1.25; 789 1,-1.25
ADP7158ARDZ-1.2-R7_ADI-L = smd 1.256 x 0.508: 1 -2.622,1.905; 2 -2.622,0.635; 3 -2.622,-0.635; 4 -2.622,-1.905; 5 2.622,-1.905; 6 2.622,-0.635; 7 2.622,0.635; 8 2.622,1.905 | smd 2.286 x 2.286: EPAD 0,0
OCTAPAK7_6P1X6P5_STM-L = smd 0.508 x 1.391: 1 -2.55,-5.652; 2 -1.7,-5.652; 3 -0.85,-5.652; 4 0,-5.652; 5 0.85,-5.652; 6 1.7,-5.652; 7 2.55,-5.652 | smd 5.41 x 5.563: 8 0,1.397
ASV = smd 1.8 x 2: 1 -2.54,-2; 2 2.54,-2; 3 2.54,2; 4 -2.54,2
3557-2 = drill 1.75: 1 -6.735,1.7; 2 -6.735,-1.7; 3 6.735,-1.7; 4 6.735,1.7

## Placement (x,y rotation side)
C1  0.1uF 50V  [C0603]  106.5,93.75 180 top
C2  0.1uF  [C0603]  103,96 0 top
C3  0.1uF  [C0603]  86.25,44.75 270 top
C4  0.1uF  [C0603]  83,58 90 bottom
C5  0.1uF  [C0603]  85.25,58 90 bottom
C6  0.1uF  [C0603]  74.75,58 90 bottom
C7  0.1uF  [C0603]  77,58 90 bottom
C8  0.1uF  [C0603]  87.5,58 90 bottom
C9  0.1uF  [C0603]  72.5,58 270 bottom
C10  0.1uF  [C0603]  85.75,60.75 0 bottom
C11  0.1uF  [C0603]  73,60.75 180 bottom
C12  0.1uF  [C0603]  85.75,63 0 bottom
C13  0.1uF  [C0603]  86,68 0 bottom
C14  0.1uF  [C0603]  73.5,69.25 180 bottom
C15  0.1uF  [C0603]  86,70.25 0 bottom
C16  0.1uF  [C0603]  72.5,72 90 bottom
C17  0.1uF  [C0603]  81,72 270 bottom
C18  0.1uF  [C0603]  77,72 270 bottom
C19  0.1uF  [C0603]  83.25,72 270 bottom
C20  0.1uF  [C0603]  74.75,72 270 bottom
C21  0.1uF  [C0603]  86,72.5 180 bottom
C22  0.1uF  [C0603]  82.75,85.25 180 bottom
C23  0.1uF  [C0603]  40.85,91.38 0 bottom
C24  GRM188R6YA106MA73D  [C0603]  78.25,24 0 bottom
C25  GRM188R6YA106MA73D  [C0603]  61.5,13 90 bottom
C26  2.2uF 50V  [C0603]  77.4,18 270 bottom
C27  22uF 16V  [C0805]  72.7,29 180 bottom
C28  22uF 16V  [C0805]  57.5,16 180 bottom
C29  10uF  [C0603]  92.4,40.4 90 bottom
C30  1uF  [C0603]  92,37 270 bottom
C31  1uF  [C0603]  80.5,38.75 0 bottom
C32  1uF  [C0603]  86.9,31.5 270 bottom
C33  1uF  [C0603]  85,42 180 bottom
D1  BLUE  [CHIP-LED0603]  108,75 270 top
D2  BLUE  [LED-0603]  75,85 0 top
D3  RED  [CHIP-LED0603]  133.25,89.75 0 top
D4  GREEN  [CHIP-LED0603]  73,5 90 top
D5  GREEN  [CHIP-LED0603]  73,7.25 90 top
D6  GREEN  [CHIP-LED0603]  73,9.75 90 top
D7  RED  [CHIP-LED0603]  8,71.25 0 top
D8  RED  [CHIP-LED0603]  19.75,31 45 top
D9  RED  [CHIP-LED0603]  22.75,74.5 180 top
D10  RED  [CHIP-LED0603]  149.5,72.25 180 top
D11  RED  [CHIP-LED0603]  142.5,30.75 136 top
DD:C1  1uF  [C0603]  41.25,73.75 180 bottom
DD:C2  1uF  [C0603]  52.75,88 0 top
DD:C3  0.022uF 50V  [C0603]  52.25,80.25 90 top
DD:C4  ECA-1HHG221  [CAP_PAN_10X12.5]  53,69.25 0 top
DD:C6  0.1uF 50V  [C0603]  32.88,72.5 180 top
DD:C7  0.1uF 50V  [C0603]  33.5,79.25 180 top
DD:C8  0.1uF 50V  [C0603]  33.5,85.75 180 top
DD:C9  2.2uF 50V  [C0603]  50,82 180 bottom
DD:C10  0.1uF 50V  [C0603]  52.75,85.75 0 top
DD:J1  8-PIN_2MM-H  [2MM-8-H]  19.25,85 270 top
DD:Q1  IRFH7545  [PQFN_5X6_E]  31.25,76 180 bottom
DD:Q2  IRFH7545  [PQFN_5X6_E]  31.25,76 180 top
DD:Q3  IRFH7545  [PQFN_5X6_E]  31.25,82.5 180 bottom
DD:Q4  IRFH7545  [PQFN_5X6_E]  31.25,82.5 180 top
DD:Q5  IRFH7545  [PQFN_5X6_E]  31.25,89 180 bottom
DD:Q6  IRFH7545  [PQFN_5X6_E]  31.25,89 180 top
DD:R1  10k  [R0603]  50,84.25 0 bottom
DD:U1  DRV8303DCA  [TSSOP-48_PAD]  45.5,81.75 90 top
F1  0805L200SLTHYR  [FUSC2113X75]  71.5,32.75 90 bottom
F2  0805L200SLTHYR  [FUSC2113X75]  58,20 135 bottom
F3  0805L200SLTHYR  [FUSC2113X75]  91.2,43.6 90 bottom
F4  0805L200SLTHYR  [FUSC2113X75]  77,37 90 bottom
IC1  MCP23017-E/SS  [SSOP-28]  41.95,99.15 0 bottom
J1  SFW8S-2STE1LF  [CON8_1X8_UB_SFW_JAE]  62.5,103.5 0 top
J2  SFW8S-2STE1LF  [CON8_1X8_UB_SFW_JAE]  62.5,95.5 0 top
J3  SFW8S-2STE1LF  [CON8_1X8_UB_SFW_JAE]  46.1,98.6 0 top
J4  SFW8S-2STE1LF  [CON8_1X8_UB_SFW_JAE]  144,76.2 90 bottom
J5  436500217  [CON_436500217_MOL]  68,114 180 bottom
J6  XT60PW-MAMASS  [XT60PW-M]  89.9,21.6 180 top
KIT1  MTRAIN  [MTRAIN-KIT]  101.5,99.5 270 top
KIT2  IMU  [IMU]  81.22,99.5 90 bottom
LED1  APA102C-5050  [APA102_5050]  45.25,113 90 top
LED2  APA102C-5050  [APA102_5050]  51.1,113 90 top
LED3  APA102C-5050  [APA102_5050]  56.75,113 90 top
M1:C1  1uF  [C0603]  50.75,60.88 0 top
M1:C2  1uF  [C0603]  50.75,63 0 top
M1:C3  0.022uF 50V  [C0603]  50,55.75 90 top
M1:C6  0.1uF 50V  [C0603]  31.5,48 180 top
M1:C7  0.1uF 50V  [C0603]  31.5,54.5 180 top
M1:C8  0.1uF 50V  [C0603]  31.5,61 180 top
M1:C9  2.2uF 50V  [C0603]  50.25,55 180 bottom
M1:C10  0.1uF 50V  [C0603]  46.75,49 0 top
M1:C12  ECA-1HHG221  [CAP_PAN_10X12.5]  32.88,100.33 90 top
M1:C13  ECA-1HHG221  [CAP_PAN_10X12.5]  122.5,50 0 top
M1:J1  430450618  [CON_430450618_MOL]  19.3,42.2 270 bottom
M1:J2  39288040  [CON_39288040]  17.8,56.1 180 bottom
M1:Q1  IRFH7545  [PQFN_5X6_E]  29.25,51.25 180 bottom
M1:Q2  IRFH7545  [PQFN_5X6_E]  29.25,51.25 180 top
M1:Q3  IRFH7545  [PQFN_5X6_E]  29.25,57.75 180 bottom
M1:Q4  IRFH7545  [PQFN_5X6_E]  29.25,57.75 180 top
M1:Q5  IRFH7545  [PQFN_5X6_E]  29.25,64.25 180 bottom
M1:Q6  IRFH7545  [PQFN_5X6_E]  29.25,64.25 180 top
M1:R1  10k  [R0603]  50.25,57.25 0 bottom
M1:U1  DRV8303DCA  [TSSOP-48_PAD]  43.5,57.25 90 top
M1:U2  N3793-6303RB  [N3793-6303RB_3MM]  9,58 270 top
M2:C1  1uF  [C0603]  63.62,30 225 top
M2:C2  1uF  [C0603]  53.75,43.5 135 top
M2:C3  0.022uF 50V  [C0603]  65.88,41.75 135 top
M2:C6  0.1uF 50V  [C0603]  58.85,25 225 top
M2:C7  0.1uF 50V  [C0603]  53.62,30.62 225 top
M2:C8  0.1uF 50V  [C0603]  48.6,35.4 45 top
M2:C9  2.2uF 50V  [C0603]  69,40.25 315 bottom
M2:C10  0.1uF 50V  [C0603]  55.25,45 135 top
M2:C12  ECA-1HHG221  [CAP_PAN_10X12.5]  36.88,69.5 180 top
M2:C13  ECA-1HHG221  [CAP_PAN_10X12.5]  129,80 0 top
M2:J1  430450618  [CON_430450618_MOL]  45,18 225 bottom
M2:J2  39288040  [CON_39288040]  34.8,24.6 135 bottom
M2:Q1  IRFH7545  [PQFN_5X6_E]  54.65,26.6 135 bottom
M2:Q2  IRFH7545  [PQFN_5X6_E]  54.65,26.6 225 top
M2:Q3  IRFH7545  [PQFN_5X6_E]  49.6,31.7 135 bottom
M2:Q4  IRFH7545  [PQFN_5X6_E]  49.6,31.7 225 top
M2:Q5  IRFH7545  [PQFN_5X6_E]  44.5,36.75 135 bottom
M2:Q6  IRFH7545  [PQFN_5X6_E]  44.5,36.75 225 top
M2:R1  10k  [R0603]  67.5,41.75 135 bottom
M2:U1  DRV8303DCA  [TSSOP-48_PAD]  59.25,37.25 135 top
M2:U2  N3793-6303RB  [N3793-6303RB_3MM]  29,20 315 top
M3:C1  1uF  [C0603]  95.88,38.17 135 top
M3:C2  1uF  [C0603]  95.47,43.67 135 top
M3:C3  0.022uF 50V  [C0603]  99.75,47.5 225 top
M3:C6  0.1uF 50V  [C0603]  118.9,41.65 315 top
M3:C7  0.1uF 50V  [C0603]  113.55,37.3 315 top
M3:C8  0.1uF 50V  [C0603]  109.2,32.45 315 top
M3:C9  2.2uF 50V  [C0603]  107.5,45.75 225 bottom
M3:C10  0.1uF 50V  [C0603]  111.25,45 135 top
M3:C12  ECA-1HHG221  [CAP_PAN_10X12.5]  66.5,19.5 270 top
M3:C13  ECA-1HHG221  [CAP_PAN_10X12.5]  112,80.5 180 top
M3:J1  430450618  [CON_430450618_MOL]  113,19 135 bottom
M3:J2  39288040  [CON_39288040]  128,30 45 bottom
M3:Q1  IRFH7545  [PQFN_5X6_E]  117.35,38.1 45 bottom
M3:Q2  IRFH7545  [PQFN_5X6_E]  117.35,38.1 315 top
M3:Q3  IRFH7545  [PQFN_5X6_E]  112.75,33.5 45 bottom
M3:Q4  IRFH7545  [PQFN_5X6_E]  112.75,33.5 315 top
M3:Q5  IRFH7545  [PQFN_5X6_E]  108.15,28.9 45 bottom
M3:Q6  IRFH7545  [PQFN_5X6_E]  108.15,28.9 315 top
M3:R1  10k  [R0603]  106,44.25 45 bottom
M3:U1  DRV8303DCA  [TSSOP-48_PAD]  103.5,41.75 225 top
M3:U2  N3793-6303RB  [N3793-6303RB_3MM]  121,13 45 top
M4:C1  1uF  [C0603]  119.25,74.75 180 top
M4:C2  1uF  [C0603]  103.88,60.75 180 top
M4:C3  0.022uF 50V  [C0603]  106.5,67.85 270 top
M4:C6  0.1uF 50V  [C0603]  126.5,73 0 top
M4:C7  0.1uF 50V  [C0603]  126.5,66.5 0 top
M4:C8  0.1uF 50V  [C0603]  126.5,60 0 top
M4:C9  2.2uF 50V  [C0603]  115,71.5 180 bottom
M4:C10  0.1uF 50V  [C0603]  103.88,63 180 top
M4:C12  ECA-1HHG221  [CAP_PAN_10X12.5]  107.5,55 180 top
M4:C13  ECA-1HHG221  [CAP_PAN_10X12.5]  40,46.5 90 top
M4:J1  430450618  [CON_430450618_MOL]  140,49 90 bottom
M4:J2  39288040  [CON_39288040]  141.6,68 0 bottom
M4:Q1  IRFH7545  [PQFN_5X6_E]  128.75,69.75 0 bottom
M4:Q2  IRFH7545  [PQFN_5X6_E]  128.75,69.75 0 top
M4:Q3  IRFH7545  [PQFN_5X6_E]  128.75,63.25 0 bottom
M4:Q4  IRFH7545  [PQFN_5X6_E]  128.75,63.25 0 top
M4:Q5  IRFH7545  [PQFN_5X6_E]  128.75,56.75 0 bottom
M4:Q6  IRFH7545  [PQFN_5X6_E]  128.75,56.75 0 top
M4:R1  10k  [R0603]  115,69.25 0 bottom
M4:U1  DRV8303DCA  [TSSOP-48_PAD]  115,66.25 270 top
M4:U2  N3793-6303RB  [N3793-6303RB_3MM]  150,49 90 top
Q1  PJA3439_R1_00001  [SOT-23]  16,71 180 top
Q2  PJA3439_R1_00001  [SOT-23]  13,35 180 top
Q3  PJA3439_R1_00001  [SOT-23]  49,73 270 bottom
Q4  PJA3439_R1_00001  [SOT-23]  142,76 180 top
Q5  PJA3439_R1_00001  [SOT-23]  136,33 180 top
R1  68k 1%  [R0603]  109.25,94.25 90 top
R2  10k 1%  [R0603]  106.5,96 180 top
R3  10k 1%  [R0603]  100.25,94.25 90 top
R4  10k 1%  [R0603]  103,93.75 0 top
R5  270  [R0603]  106.7,80 270 top
R6  4.7k  [R0603]  91.25,92 90 top
R7  4.7k  [R0603]  88.75,92 90 top
R8  68k  [R0603]  84,44.75 90 top
R9  10k  [R0603]  88.5,44.75 270 top
R10  4.7k  [R0603]  89.75,58 90 bottom
R11  270  [R0603]  68.25,74.5 270 bottom
R12  4.7k  [R0603]  86,75.75 180 bottom
R13  50k  [R0603]  54,106.5 180 top
R14  270k  [R0603]  84.25,25.75 270 bottom
R15  100k  [R0603]  84.75,28.5 0 bottom
R16  150k  [R0603]  78.25,20.75 0 bottom
R17  43.2k  [R0603]  75.1,17.95 90 bottom
R18  29.4k  [R0603]  62.5,9 90 bottom
R19  150k  [R0603]  64.5,13 270 bottom
R20  15k  [R0603]  72.5,44.75 90 bottom
R22  1k  [R0603]  72.65,40 90 bottom
R23  160k 1%  [R0603]  70.75,26.5 180 bottom
R24  30.1k 1%  [R0603]  72,18.5 180 bottom
R25  160k 1%  [R0603]  55.5,8 0 bottom
R26  51.0k 1%  [R0603]  59,8 0 bottom
R27  0  [R0603]  71,36 0 bottom
R28  0  [R0603]  61.5,23.5 135 bottom
R29  1k  [R0603]  73,5 0 bottom
R30  1k  [R0603]  73,7.25 180 bottom
R31  1k  [R0603]  73,9.75 180 bottom
R32  0  [R0603]  89.9,40.5 90 bottom
R33  0  [R0603]  80.5,36.4 0 bottom
R34  330  [R0603]  13,71 90 top
R35  330  [R0603]  13,31 0 top
R36  330  [R0603]  24,71 90 top
R37  330  [R0603]  137,76 180 top
R38  330  [R0603]  132,34 180 top
RN1  330  [RA-8_2506]  78.25,51 180 top
RN2  330  [RA-8_2506]  92.18,51.82 225 top
RN3  330  [RA-8_2506]  65.93,51.82 135 top
RN4  330  [RA-8_2506]  93.5,63 270 top
RN5  330  [RA-8_2506]  63.5,61.5 90 top
RN6  330  [RA-8_2506]  63.5,68.25 90 top
RN7  330  [RA-8_2506]  93.5,70 270 top
RN8  330  [RA-8_2506]  63.5,75.25 90 top
RN9  330  [RA-8_2506]  53.05,91.55 90 bottom
S1  94HCB16T  [HEX]  36.6,108.95 270 top
S2  TT11EGPC1  [TT11EGPC1]  142,92 270 top
U1  XC3S250E-4TQG144C  [TQFP144]  79,65 90 top
U2  SN74AHC1G125  [SOT-23-5]  48.62,106.25 0 top
U3  MPM3620GQV-P  [MPM3620GQV-P]  73,22.5 90 bottom
U4  MPM3620GQV-P  [MPM3620GQV-P]  57,12 90 bottom
U6  MCP1824T-2502E/OT  [SOT-23-5]  80.5,33 0 bottom
U7  ADP7158ARDZ-1.2-R7ADP7158ARDZ-1.2-R7_ADI-L  [ADP7158ARDZ-1.2-R7_ADI-L]  87,36 0 bottom
U8  VN7004CLHTR  [OCTAPAK7_6P1X6P5_STM-L]  78,37 180 top
U$1  [DRIBBLER]  21.25,90.5 270 top
U$2  [ERR-KICK]  135,90 90 top
U$3  [ERR-DRIB]  24,76.5 270 top
U$4  [ROBOBUZZ_1.0X2]  66.5,75.5 0 top
U$5  [ERR-M4]  147,72.5 90 top
U$6  [ERR-M1]  10.5,71.5 270 top
U$7  [MOTOR-1]  12.25,69.31 270 top
U$8  [MOTOR-4]  145.75,38.06 90 top
U$9  [MOTOR-2]  23.25,30.81 315 top
U$10  [ERR-M3]  144,29.5 45 top
U$11  [ERR-M2]  18,29 315 top
U$12  [MOTOR-3]  110.25,7.56 45 top
U$100  [KICKER]  136.75,74.56 90 bottom
X1  ASV-18.432MHZ-EJ-T  [ASV]  81.25,80.75 180 bottom
XF1  30A  [3557-2]  102.5,14.5 270 top

## Library data of the parts
C1-C22 C26 C29-C33 R1-R13 R27 R28 R30-R38 = resistor
C23-C25 DD:C1-DD:C3 DD:C6-DD:C10 DD:R1 M1:C1-M1:C3 M1:C6-M1:C10 M1:R1 M2:C1-M2:C3 M2:C6-M2:C10 M2:R1 M3:C1-M3:C3 M3:C6-M3:C10 M3:R1 M4:C1-M4:C3 M4:C6-M4:C10 M4:R1 R14 R15 R20 R22 R29 = rcl
C27 C28 = rcl; SPICEPREFIX: C
D1 = RoboJackets-LEDs; DIGIKEY: 160-1647-1-ND; MPN: LTST-C191TBKT
D2 = RoboJackets-LEDs; PROD_ID: DIO-08575
D3 D7-D11 = RoboJackets-LEDs; DIGIKEY: 160-1447-1-ND; MPN: LTST-C191KRKT
D4-D6 = RoboJackets-LEDs; DIGIKEY: 160-1446-1-ND; MPN: LTST-C191KGKT
DD:C4 M1:C12 M1:C13 M2:C12 M2:C13 M3:C12 M3:C13 M4:C12 M4:C13 = RoboJackets-Capacitors; DIGIKEY: P5572-ND; MANUFACTURER_PART_NUMBER: ECA-1HHG221
DD:J1 = RoboJackets-Connectors; DIGIKEY: WM18937-ND; MPN: 0353630860
DD:Q1-DD:Q6 M1:Q1-M1:Q6 M2:Q1-M2:Q6 M3:Q1-M3:Q6 M4:Q1-M4:Q6 = RoboJackets-Discrete; DKPN: IRFH7545TRPBFCT-ND; MPN: IRFH7545TRPBF
DD:U1 M1:U1 M2:U1 M3:U1 M4:U1 = RoboJackets-PowerICs; DIGIKEY: 296-40070-1-ND; MPN: DRV8303DCAR
F1-F4 = RoboJackets-Fuses
IC1 = RoboJackets-ICs; DIGIKEY: MCP23017-E/SS-ND; MPN: MCP23017-E/SS
J1-J4 J6 = RoboJackets-Connectors
J5 = RoboJackets-Connectors; COPYRIGHT: Copyright (C) 2022 Ultra Librarian. All rights reserved.; DIGI-KEY_PART_NUMBER_1: WM12762-ND; MANUFACTURER_PART_NUMBER: 436500217; MFR_NAME: Molex Connector Corporation
KIT1 KIT2 = RoboJackets-Boards
LED1-LED3 = RoboJackets-ICs; DIGIKEY: 1568-1902-ND; MPN: APA1025050
M1:J1 M2:J1 M3:J1 M4:J1 = RoboJackets-Connectors; COPYRIGHT: Copyright (C) 2022 Ultra Librarian. All rights reserved.; MANUFACTURER_PART_NUMBER: 430450618; MFR_NAME: Molex Connector Corporation
M1:J2 M2:J2 M3:J2 M4:J2 = RoboJackets-Connectors; COPYRIGHT: Copyright (C) 2022 Ultra Librarian. All rights reserved.; MANUFACTURER_PART_NUMBER: 39288040; MFR_NAME: Molex Connector Corporation
M1:U2 M2:U2 M3:U2 M4:U2 = RoboJackets-Connectors; COPYRIGHT: Copyright (C) 2022 Ultra Librarian. All rights reserved.; MANUFACTURER_PART_NUMBER: N3793-6303RB; MFR_NAME: 3M
Q1-Q5 = RoboJackets-Discrete
R16-R19 R23-R26 = rcl; SPICEPREFIX: R
RN1-RN9 = RoboJackets-Resistors; DIGIKEY: 742C163331JPCT-ND; MPN: 742C163331JP
S1 = RoboJackets-Switches; DKPN: GH7372-ND
S2 = RoboJackets-Switches
U1 = RoboJackets-ICs; DIGIKEY: 122-1524-ND; MPN: XC3S250E-4TQG144C
U2 = RoboJackets-ICs; DKPN: 296-8744-1-ND
U3 U4 = RoboJackets-PowerICs; DIGIKEY: 1589-1252-1-ND; DKPN: 1589-1252-1-ND; MPN: MPM3620GQV-P
U6 = RoboJackets-PowerICs; DKPN: MCP1824T-2502E/OTCT-ND; VOLT: 2.5V
U7 = RoboJackets-PowerICs; COPYRIGHT: Copyright (C) 2022 Ultra Librarian. All rights reserved.; DIGI-KEY_PART_NUMBER_1: ADP7158ARDZ-1.2-R7TR-ND; DIGI-KEY_PART_NUMBER_2: ADP7158ARDZ-1.2-R7CT-ND; DIGI-KEY_PART_NUMBER_3: ADP7158ARDZ-1.2-R7DKR-ND; MANUFACTURER_PART_NUMBER: ADP7158ARDZ-1.2-R7; MFR_NAME: Analog Devices Inc
U8 = RoboJackets-PowerICs; COPYRIGHT: Copyright (C) 2022 Ultra Librarian. All rights reserved.; DIGI-KEY_PART_NUMBER_1: 497-16866-2-ND; DIGI-KEY_PART_NUMBER_2: 497-16866-1-ND; DIGI-KEY_PART_NUMBER_3: 497-16866-6-ND; MANUFACTURER_PART_NUMBER: VN7004CLHTR; MFR_NAME: STMicroelectronics
U$1-U$12 U$100 = RoboJackets-Aesthetics
X1 = RoboJackets-FreqGen; DIGIKEY: 535-9314-1-ND; MPN: ASV-18.432MHZ-EJ-T
XF1 = RoboJackets-Fuses; DIGIKEY: 36-3557-2-ND; MPN: 3557-2

## Nets
5V-LED: D5.A R30.2
5V-LED1: D6.A R31.2
18.5V-LED: D4.A R29.1
!CS!-DOT: KIT1.P$11 U2.1
!CS!-FPGA: KIT1.P$31 U1.69
!CS!-ICM: KIT1.P$18 KIT2.4
!CS!-IR: J3.4 KIT1.P$10
!CS!-KICK: J4.5 KIT1.P$8
!CS!-RAD0: J2.5 KIT1.P$17
!RST!-I2C: J1.5 RN9.11
!RST!-IR: J3.5 KIT1.P$9
!RST!-KICK: J4.4 KIT1.P$7
!RST!-RADIO: J2.6 KIT1.P$19
+1.2V: C6.1 C10.1 C14.1 C19.1 F3.2 U1.9 U1.45 U1.80 U1.115
+1.2V-PRE: C29.1 R32.1 U7.1 U7.2
+2.5V: C4.1 C9.1 C15.1 C20.1 F4.2 R10.2 U1.30 U1.65 U1.102 U1.137
+2.5V-PRE: C31.1 R33.1 U6.5
+3.3V: C5.1 C7.1 C8.1 C11.1 C12.1 C13.1 C16.1 C17.1 C18.1 C21.1 C22.1 C23.1 D3.A D7.A D8.A D9.A D10.A D11.A DD:C1.1 DD:C10.1 DD:R1.1 DD:U1.19 DD:U1.45 IC1.9 IC1.15 IC1.18 J3.6 J4.2 KIT2.8 R6.2 R7.2 R12.1 R28.2 R31.1 U1.13 U1.28 U1.42 U1.49 U1.57 U1.60 U1.62 U1.64 U1.79 U1.100 U1.121 U1.138 U1.143 U2.5 U6.1 U6.3 U7.4 U7.8 X1.1 X1.4
+3.3V-FUSE: C28.1 F2.1 R25.2 U4.789
+5V: DD:J1.5 J1.8 J2.1 KIT1.VIN LED1.1 LED2.1 LED3.1 M1:J1.5 M1:U2.9 M2:J1.5 M2:U2.9 M3:J1.5 M3:U2.9 M4:J1.5 M4:U2.9 R3.1 R27.2 R30.1
+5V-FUSE: C27.1 F1.1 R23.2 U3.789
+18.5V: C24.1 C25.1 DD:C4.1 DD:Q1.5678 DD:Q3.5678 DD:Q5.5678 DD:U1.25 M1:C12.1 M1:C13.1 M1:Q1.5678 M1:Q3.5678 M1:Q5.5678 M1:U1.25 M2:C12.1 M2:C13.1 M2:Q1.5678 M2:Q3.5678 M2:Q5.5678 M2:U1.25 M3:C12.1 M3:C13.1 M3:Q1.5678 M3:Q3.5678 M3:Q5.5678 M3:U1.25 M4:C12.1 M4:C13.1 M4:Q1.5678 M4:Q3.5678 M4:Q5.5678 M4:U1.25 R1.1 R8.1 R29.2 U3.16 U4.16 XF1.3 XF1.4
AAM: R17.2 U3.18
AAM1: R18.2 U4.18
BATT-FPGA: C3.1 R8.2 R9.1 U1.136
BYP: C30.1 U7.3
DD-!CS: DD:U1.4 RN6.11
DD-!FAULT!: DD:U1.2 Q3.1
DD-A-H: DD:U1.13 RN6.9
DD-A-L: DD:U1.14 RN8.16
DD-B-H: DD:U1.15 RN8.15
DD-B-L: DD:U1.16 RN8.14
DD-C-H: DD:U1.17 RN8.13
DD-C-L: DD:U1.18 RN8.12
DD-H1: DD:J1.3 RN8.11
DD-H2: DD:J1.2 RN8.10
DD-H3: DD:J1.1 RN8.9
DD:!OCTW: DD:U1.1
DD:AVDD: DD:C2.1 DD:U1.23
DD:BST-A: DD:C6.1 DD:U1.44
DD:BST-B: DD:C7.1 DD:U1.39
DD:BST-C: DD:C8.1 DD:U1.34
DD:CP1: DD:C3.1 DD:U1.10
DD:CP2: DD:C3.2 DD:U1.11
DD:EN-GATE: DD:R1.2 DD:U1.12
DD:GH-A: DD:Q1.4 DD:U1.43
DD:GH-B: DD:Q3.4 DD:U1.38
DD:GH-C: DD:Q5.4 DD:U1.33
DD:GL-A: DD:Q2.4 DD:U1.41
DD:GL-B: DD:Q4.4 DD:U1.36
DD:GL-C: DD:Q6.4 DD:U1.31
DD:GVDD: DD:C9.1 DD:U1.9
DD:PHASE-A: DD:C6.2 DD:J1.8 DD:Q1.1 DD:Q1.2 DD:Q1.3 DD:Q2.5678 DD:U1.42
DD:PHASE-B: DD:C7.2 DD:J1.7 DD:Q3.1 DD:Q3.2 DD:Q3.3 DD:Q4.5678 DD:U1.37
DD:PHASE-C: DD:C8.2 DD:J1.6 DD:Q5.1 DD:Q5.2 DD:Q5.3 DD:Q6.5678 DD:U1.32
DOT-CLK-1: LED1.5 R13.2 U2.4
DOT-CLK-1-2: LED1.2 LED2.5
DOT-CLK-2-3: LED2.2 LED3.5
DOT-MOSI-1-2: LED1.3 LED2.4
DOT-MOSI-2-3: LED2.3 LED3.4
EN: C26.1 R16.2 U3.17
EN1: R19.2 U4.17
EN-PWR: R16.1 R19.1 S2.3 U8.4
EN-PWR-PRE: R14.1 R15.2 S2.2
EXTRA-IND: KIT1.P$12 R5.1
FB: R23.1 R24.2 U3.1
FB1: R25.1 R26.2 U4.1
FPGA-CLK: U1.50 X1.3
FPGA-DONE: KIT1.P$15 R11.1 U1.72
FPGA-INIT: KIT1.P$14 R12.2 U1.40
FPGA-PROG: KIT1.P$13 R10.1 U1.1
GND: C1.2 C2.2 C3.2 C4.2 C5.2 C6.2 C7.2 C8.2 C9.2 C10.2 C11.2 C12.2 C13.2 C14.2 C15.2 C16.2 C17.2 C18.2 C19.2 C20.2 C21.2 C22.2 C23.2 C24.2 C25.2 C26.2 C27.2 C28.2 C29.2 C30.2 C31.2 C32.2 C33.2 D1.C D2.C D4.C D5.C D6.C DD:C1.2 DD:C2.2 DD:C4.2 DD:C9.2 DD:C10.2 DD:J1.4 DD:Q2.1 DD:Q2.2 DD:Q2.3 DD:Q4.1 DD:Q4.2 DD:Q4.3 DD:Q6.1 DD:Q6.2 DD:Q6.3 DD:U1.3 DD:U1.8 DD:U1.20 DD:U1.24 DD:U1.30 DD:U1.35 DD:U1.40 DD:U1.46 DD:U1.47 DD:U1.48 DD:U1.PAD IC1.10 IC1.16 IC1.17 J1.2 J2.2 J3.7 J4.3 J5.2 J6.P$1 J6.P$3 KIT1.GND KIT2.5 LED1.6 LED2.6 LED3.6 M1:C1.2 M1:C2.2 M1:C9.2 M1:C10.2 M1:C12.2 M1:C13.2 M1:J1.4 M1:Q2.1 M1:Q2.2 M1:Q2.3 M1:Q4.1 M1:Q4.2 M1:Q4.3 M1:Q6.1 M1:Q6.2 M1:Q6.3 M1:U1.3 M1:U1.8 M1:U1.24 M1:U1.30 M1:U1.35 M1:U1.40 M1:U1.46 M1:U1.47 M1:U1.48 M1:U1.PAD M1:U2.7 M2:C1.2 M2:C2.2 M2:C9.2 M2:C10.2 M2:C12.2 M2:C13.2 M2:J1.4 M2:Q2.1 M2:Q2.2 M2:Q2.3 M2:Q4.1 M2:Q4.2 M2:Q4.3 M2:Q6.1 M2:Q6.2 M2:Q6.3 M2:U1.3 M2:U1.8 M2:U1.24 M2:U1.30 M2:U1.35 M2:U1.40 M2:U1.46 M2:U1.47 M2:U1.48 M2:U1.PAD M2:U2.7 M3:C1.2 M3:C2.2 M3:C9.2 M3:C10.2 M3:C12.2 M3:C13.2 M3:J1.4 M3:Q2.1 M3:Q2.2 M3:Q2.3 M3:Q4.1 M3:Q4.2 M3:Q4.3 M3:Q6.1 M3:Q6.2 M3:Q6.3 M3:U1.3 M3:U1.8 M3:U1.24 M3:U1.30 M3:U1.35 M3:U1.40 M3:U1.46 M3:U1.47 M3:U1.48 M3:U1.PAD M3:U2.7 M4:C1.2 M4:C2.2 M4:C9.2 M4:C10.2 M4:C12.2 M4:C13.2 M4:J1.4 M4:Q2.1 M4:Q2.2 M4:Q2.3 M4:Q4.1 M4:Q4.2 M4:Q4.3 M4:Q6.1 M4:Q6.2 M4:Q6.3 M4:U1.3 M4:U1.8 M4:U1.24 M4:U1.30 M4:U1.35 M4:U1.40 M4:U1.46 M4:U1.47 M4:U1.48 M4:U1.PAD M4:U2.7 Q1.3 Q2.3 Q3.3 Q4.3 Q5.3 R2.2 R4.2 R9.2 R13.1 R15.1 R17.1 R18.1 R20.1 R22.1 R24.1 R26.1 S1.C1 S1.C2 S2.1 U1.11 U1.19 U1.27 U1.37 U1.46 U1.55 U1.61 U1.73 U1.90 U1.99 U1.118 U1.127 U1.133 U2.3 U3.3 U3.12 U3.13 U3.14 U4.3 U4.12 U4.13 U4.14 U6.2 U7.EPAD U8.7 X1.2
GPB0: IC1.1 RN9.8
GPB1: IC1.2 RN9.7
GPB2: IC1.3 RN9.6
GPB3: IC1.4 RN9.5
GPB4: IC1.5 RN9.4
GPB5: IC1.6 RN9.3
GPB6: IC1.7 RN9.2
GPB7: IC1.8 RN9.1
HEX-0: IC1.28 S1.1
HEX-1: IC1.25 S1.2
HEX-2: IC1.27 S1.4
HEX-3: IC1.26 S1.8
INT-I2C: J1.4 KIT1.P$3
INT-ICM: KIT1.P$16 KIT2.6
INT-IO: IC1.20 KIT1.P$20
INT-RAD0: J2.4 KIT1.P$30
LED-DD: D9.C R36.2
LED-KICK: D3.C RN9.9
LED-M1: D7.C R34.2
LED-M2: D8.C R35.2
LED-M3: D11.C R38.2
LED-M4: D10.C R37.2
M1-!CS: M1:U1.4 RN5.13
M1-!FAULT!: M1:U1.2 Q1.1
M1-A-H: M1:U1.15 RN5.9
M1-A-L: M1:U1.16 RN6.16
M1-B-H: M1:U1.13 RN5.11
M1-B-L: M1:U1.14 RN5.10
M1-C-H: M1:U1.17 RN6.14
M1-C-L: M1:U1.18 RN6.13
M1-ENC-A: M1:U2.8 RN5.14
M1-ENC-B: M1:U2.4 RN5.12
M1-H1: M1:J1.1 RN6.10
M1-H2: M1:J1.2 RN6.12
M1-H3: M1:J1.3 RN6.15
M1:!OCTW: M1:U1.1
M1:+3.3V: M1:C1.1 M1:C10.1 M1:R1.1 M1:U1.19 M1:U1.20 M1:U1.45
M1:AVDD: M1:C2.1 M1:U1.23
M1:BST-A: M1:C6.1 M1:U1.44
M1:BST-B: M1:C7.1 M1:U1.39
M1:BST-C: M1:C8.1 M1:U1.34
M1:CP1: M1:C3.1 M1:U1.10
M1:CP2: M1:C3.2 M1:U1.11
M1:EN-GATE: M1:R1.2 M1:U1.12
M1:GH-A: M1:Q1.4 M1:U1.43
M1:GH-B: M1:Q3.4 M1:U1.38
M1:GH-C: M1:Q5.4 M1:U1.33
M1:GL-A: M1:Q2.4 M1:U1.41
M1:GL-B: M1:Q4.4 M1:U1.36
M1:GL-C: M1:Q6.4 M1:U1.31
M1:GVDD: M1:C9.1 M1:U1.9
M1:PHASE-A: M1:C7.2 M1:J2.4 M1:Q3.1 M1:Q3.2 M1:Q3.3 M1:Q4.5678 M1:U1.37
M1:PHASE-B: M1:C6.2 M1:J2.1 M1:Q1.1 M1:Q1.2 M1:Q1.3 M1:Q2.5678 M1:U1.42
M1:PHASE-C: M1:C8.2 M1:J2.3 M1:Q5.1 M1:Q5.2 M1:Q5.3 M1:Q6.5678 M1:U1.32
M1:SO1: M1:U1.21
M1:SO2: M1:U1.22
M2-!CS: M2:U1.4 RN3.16
M2-!FAULT!: M2:U1.2 Q2.1
M2-A-H: M2:U1.15 RN3.13
M2-A-L: M2:U1.16 RN3.12
M2-B-H: M2:U1.13 RN3.15
M2-B-L: M2:U1.14 RN3.14
M2-C-H: M2:U1.17 RN3.11
M2-C-L: M2:U1.18 RN3.10
M2-ENC-A: M2:U2.8 RN1.10
M2-ENC-B: M2:U2.4 RN1.9
M2-H1: M2:J1.1 RN5.15
M2-H2: M2:J1.2 RN5.16
M2-H3: M2:J1.3 RN3.9
M2:!OCTW: M2:U1.1
M2:+3.3V: M2:C1.1 M2:C10.1 M2:R1.1 M2:U1.19 M2:U1.20 M2:U1.45
M2:AVDD: M2:C2.1 M2:U1.23
M2:BST-A: M2:C6.1 M2:U1.44
M2:BST-B: M2:C7.1 M2:U1.39
M2:BST-C: M2:C8.1 M2:U1.34
M2:CP1: M2:C3.1 M2:U1.10
M2:CP2: M2:C3.2 M2:U1.11
M2:EN-GATE: M2:R1.2 M2:U1.12
M2:GH-A: M2:Q1.4 M2:U1.43
M2:GH-B: M2:Q3.4 M2:U1.38
M2:GH-C: M2:Q5.4 M2:U1.33
M2:GL-A: M2:Q2.4 M2:U1.41
M2:GL-B: M2:Q4.4 M2:U1.36
M2:GL-C: M2:Q6.4 M2:U1.31
M2:GVDD: M2:C9.1 M2:U1.9
M2:PHASE-A: M2:C7.2 M2:J2.4 M2:Q3.1 M2:Q3.2 M2:Q3.3 M2:Q4.5678 M2:U1.37
M2:PHASE-B: M2:C6.2 M2:J2.1 M2:Q1.1 M2:Q1.2 M2:Q1.3 M2:Q2.5678 M2:U1.42
M2:PHASE-C: M2:C8.2 M2:J2.3 M2:Q5.1 M2:Q5.2 M2:Q5.3 M2:Q6.5678 M2:U1.32
M2:SO1: M2:U1.21
M2:SO2: M2:U1.22
M3-!CS: M3:U1.4 RN4.12
M3-!FAULT!: M3:U1.2 Q5.1
M3-A-H: M3:U1.15 RN4.9
M3-A-L: M3:U1.16 RN2.16
M3-B-H: M3:U1.13 RN4.11
M3-B-L: M3:U1.14 RN4.10
M3-C-H: M3:U1.17 RN2.15
M3-C-L: M3:U1.18 RN2.14
M3-ENC-A: M3:U2.8 RN2.10
M3-ENC-B: M3:U2.4 RN2.9
M3-H1: M3:J1.1 RN2.11
M3-H2: M3:J1.2 RN2.12
M3-H3: M3:J1.3 RN2.13
M3:!OCTW: M3:U1.1
M3:+3.3V: M3:C1.1 M3:C10.1 M3:R1.1 M3:U1.19 M3:U1.20 M3:U1.45
M3:AVDD: M3:C2.1 M3:U1.23
M3:BST-A: M3:C6.1 M3:U1.44
M3:BST-B: M3:C7.1 M3:U1.39
M3:BST-C: M3:C8.1 M3:U1.34
M3:CP1: M3:C3.1 M3:U1.10
M3:CP2: M3:C3.2 M3:U1.11
M3:EN-GATE: M3:R1.2 M3:U1.12
M3:GH-A: M3:Q1.4 M3:U1.43
M3:GH-B: M3:Q3.4 M3:U1.38
M3:GH-C: M3:Q5.4 M3:U1.33
M3:GL-A: M3:Q2.4 M3:U1.41
M3:GL-B: M3:Q4.4 M3:U1.36
M3:GL-C: M3:Q6.4 M3:U1.31
M3:GVDD: M3:C9.1 M3:U1.9
M3:PHASE-A: M3:C7.2 M3:J2.4 M3:Q3.1 M3:Q3.2 M3:Q3.3 M3:Q4.5678 M3:U1.37
M3:PHASE-B: M3:C6.2 M3:J2.1 M3:Q1.1 M3:Q1.2 M3:Q1.3 M3:Q2.5678 M3:U1.42
M3:PHASE-C: M3:C8.2 M3:J2.3 M3:Q5.1 M3:Q5.2 M3:Q5.3 M3:Q6.5678 M3:U1.32
M3:SO1: M3:U1.21
M3:SO2: M3:U1.22
M4-!CS: M4:U1.4 RN7.16
M4-!FAULT!: M4:U1.2 Q4.1
M4-A-H: M4:U1.15 RN7.15
M4-A-L: M4:U1.16 RN7.14
M4-B-H: M4:U1.13 RN4.16
M4-B-L: M4:U1.14 RN4.15
M4-C-H: M4:U1.17 RN7.13
M4-C-L: M4:U1.18 RN7.12
M4-ENC-A: M4:U2.8 RN4.14
M4-ENC-B: M4:U2.4 RN4.13
M4-H1: M4:J1.1 RN7.9
M4-H2: M4:J1.2 RN7.10
M4-H3: M4:J1.3 RN7.11
M4:!OCTW: M4:U1.1
M4:+3.3V: M4:C1.1 M4:C10.1 M4:R1.1 M4:U1.19 M4:U1.20 M4:U1.45
M4:AVDD: M4:C2.1 M4:U1.23
M4:BST-A: M4:C6.1 M4:U1.44
M4:BST-B: M4:C7.1 M4:U1.39
M4:BST-C: M4:C8.1 M4:U1.34
M4:CP1: M4:C3.1 M4:U1.10
M4:CP2: M4:C3.2 M4:U1.11
M4:EN-GATE: M4:R1.2 M4:U1.12
M4:GH-A: M4:Q1.4 M4:U1.43
M4:GH-B: M4:Q3.4 M4:U1.38
M4:GH-C: M4:Q5.4 M4:U1.33
M4:GL-A: M4:Q2.4 M4:U1.41
M4:GL-B: M4:Q4.4 M4:U1.36
M4:GL-C: M4:Q6.4 M4:U1.31
M4:GVDD: M4:C9.1 M4:U1.9
M4:PHASE-A: M4:C7.2 M4:J2.4 M4:Q3.1 M4:Q3.2 M4:Q3.3 M4:Q4.5678 M4:U1.37
M4:PHASE-B: M4:C6.2 M4:J2.1 M4:Q1.1 M4:Q1.2 M4:Q1.3 M4:Q2.5678 M4:U1.42
M4:PHASE-C: M4:C8.2 M4:J2.3 M4:Q5.1 M4:Q5.2 M4:Q5.3 M4:Q6.5678 M4:U1.32
M4:SO1: M4:U1.21
M4:SO2: M4:U1.22
MISO: J3.1 J4.8 KIT1.P$5 KIT2.2
MISO-AUX: DD:U1.6 M1:U1.6 M2:U1.6 M3:U1.6 M4:U1.6 RN1.12
MISO-FPGA: KIT1.P$35 U1.44
MISO-RADIO: J2.3 KIT1.P$28
MOSI: J3.2 J4.7 KIT1.P$4 KIT2.1 LED1.4
MOSI-AUX: DD:U1.5 M1:U1.5 M2:U1.5 M3:U1.5 M4:U1.5 RN1.11
MOSI-FPGA: KIT1.P$36 U1.63
MOSI-RADIO: J2.7 KIT1.P$27
N$1: F2.2 R28.1
N$2: F1.2 R27.1
N$3: F3.1 R32.2
N$4: F4.1 R33.2
N$5: D2.A R11.2
N$6: D1.A R5.2
N$7: R22.2 U8.6
N$8: R20.2 U8.5
PWR-ERR: U6.4
R-D-DD: Q3.2 R36.1
R-D-M1: Q1.2 R34.1
R-D-M2: Q2.2 R35.1
R-D-M3: Q5.2 R38.1
R-D-M4: Q4.2 R37.1
R-P1: RN8.1 U1.82
R-P2: RN8.2 U1.81
R-P3: RN8.3 U1.77
R-P4: RN8.4 U1.76
R-P5: RN8.5 U1.75
R-P6: RN8.6 U1.74
R-P7: RN8.7 U1.70
R-P8: RN8.8 U1.68
R-P9: RN6.1 U1.91
R-P10: RN6.2 U1.89
R-P11: RN6.3 U1.88
R-P12: RN6.4 U1.87
R-P13: RN6.5 U1.86
R-P14: RN6.6 U1.85
R-P15: RN6.7 U1.84
R-P16: RN6.8 U1.83
R-P17: RN5.1 U1.101
R-P18: RN5.2 U1.98
R-P19: RN5.3 U1.97
R-P20: RN5.4 U1.96
R-P21: RN5.5 U1.95
R-P22: RN5.6 U1.94
R-P23: RN5.7 U1.93
R-P24: RN5.8 U1.92
R-P25: RN3.1 U1.117
R-P26: RN3.2 U1.116
R-P27: RN3.3 U1.113
R-P28: RN3.4 U1.112
R-P29: RN3.5 U1.106
R-P30: RN3.6 U1.105
R-P31: RN3.7 U1.104
R-P32: RN3.8 U1.103
R-P36: RN1.4 U1.125
R-P37: RN1.5 U1.124
R-P38: RN1.6 U1.123
R-P39: RN1.7 U1.122
R-P40: RN1.8 U1.119
R-P41: RN2.1 U1.5
R-P42: RN2.2 U1.4
R-P43: RN2.3 U1.3
R-P44: RN2.4 U1.2
R-P45: RN2.5 U1.142
R-P46: RN2.6 U1.141
R-P47: RN2.7 U1.140
R-P48: RN2.8 U1.139
R-P49: RN4.1 U1.21
R-P50: RN4.2 U1.20
R-P51: RN4.3 U1.17
R-P52: RN4.4 U1.16
R-P53: RN4.5 U1.15
R-P54: RN4.6 U1.14
R-P55: RN4.7 U1.8
R-P56: RN4.8 U1.7
R-P57: RN7.1 U1.35
R-P58: RN7.2 U1.34
R-P59: RN7.3 U1.32
R-P60: RN7.4 U1.31
R-P61: RN7.5 U1.26
R-P62: RN7.6 U1.25
R-P63: RN7.7 U1.24
R-P64: RN7.8 U1.23
REF_NET: C32.1 U7.5 U7.6
SCK: J3.3 J4.6 KIT1.P$6 KIT2.3 U2.2
SCK-AUX: DD:U1.7 M1:U1.7 M2:U1.7 M3:U1.7 M4:U1.7 RN1.13
SCK-FPGA: KIT1.P$34 U1.71
SCK-RADIO: J2.8 KIT1.P$29
SCL: IC1.12 J1.3 KIT1.P$25 R7.1
SDA: IC1.13 J1.6 KIT1.P$26 R6.1
SENSE-BATT: C1.1 KIT1.P$33 R1.2 R2.1
SENSE-VIN: C2.1 KIT1.P$32 R3.2 R4.1
SW: U3.456
SW1: U4.456
VBATT: J5.1 U8.1 U8.2 U8.3 XF1.1 XF1.2
VBUS: KIT1.VBUS
VDD: KIT1.VDD
VIN: J6.P$2 J6.P$4 R14.2 U8.8
VREG: C33.1 U7.7

## Tracks (layer width: path | path; a pad name or v marks a point on that pad's centre or on a via)
5V-LED  (via drill 0.35)
  Top 0.3: D5.A v73.75,8.25
  Bottom 0.3: v73.75,8.25 73.75,7.35 R30.2
5V-LED1  (via drill 0.35)
  Top 0.3: D6.A v73.75,10.88
  Bottom 0.3: v73.75,10.88 73.85,10.77 R31.2
18.5V-LED  (via drill 0.35)
  Top 0.3: D4.A v73.75,6
  Bottom 0.3: v73.75,6 73.75,5.1 R29.1
!CS!-DOT
  Top 0.15: KIT1.P$11 100.57,110.93 102,109.5 103.5,109.5 104.12,110.12 104.12,111.62 102.62,113.12 92.17,113.12 91.87,112.83 86.86,112.83 86.05,112.01 86.05,110.59 85.4,109.94 82.04,109.94 80.9,111.08 80.9,111.34 80.32,111.92 74.41,111.92 72.36,109.87 67.37,109.87 67.36,109.88 64.54,109.88 63.09,108.42 60.98,108.42 60.66,108.1 60.66,106.71 57.55,103.6 48.58,103.6 48.02,104.16 48.02,104.6 U2.1
!CS!-FPGA  (via drill 0.35)
  Top 0.3: U1.69 71.75,74.6 72.35,74 v72.75,74
  Bottom 0.3: v72.75,74 72.75,78.11 73.64,79 75.5,79 76.5,80 76.5,83.5 79.5,86.5 101.2,86.5 KIT1.P$31
!CS!-ICM
  Bottom 0.3: KIT1.P$18 82.45,108.2 81.25,107 81.25,96.99 KIT2.4
!CS!-IR  (via drill 0.35)
  Top 0.15: 102.57,110.93 KIT1.P$10
  Top 0.2: v76,109 85,109 86.38,110.38 86.38,111.88 87,112.5 101,112.5 102.57,110.93 | v63.3,103.7 63.3,102.25 63.3,102.02 61.73,100.45 57.53,100.45 55,97.93 55,97.4 54.65,97.05 50.04,97.05 49.55,97.54 49.55,101.81 J3.4
  Bottom 0.2: v63.3,103.7 68.05,108.45 72.23,108.45 72.78,109 v76,109
!CS!-KICK  (via drill 0.35)
  Top 0.2: v120,90.5 v128.5,90.5
  Bottom 0.2: KIT1.P$8 109,109.78 109,101.5 v120,90.5
  Bottom 0.3: v128.5,90.5 138.8,80.2 J4.5
!CS!-RAD0  (via drill 0.35)
  Top 0.2: v66.94,105.56 66.94,108.21 67.09,108.35 84.9,108.35 v85,108.45 | v66.95,93 66.95,95.05 J2.5
  3v3 0.2: v66.94,105.56 v66.94,93 v66.95,93
  Bottom 0.3: v85,108.45 v84.99,108.46 KIT1.P$17
!RST!-I2C  (via drill 0.35)
  Top 0.3: J1.5 66.5,97.18 65.89,96.58 65.89,92.3 66.52,91.67 66.52,89.5 v66.22,89.2
  Bottom 0.2: 54.75,92.75 58.2,92.75 60.07,94.62 60.8,94.62 v66.22,89.2
  Bottom 0.3: RN9.11 54.75,92.75
!RST!-IR  (via drill 0.35)
  Top 0.2: J3.5 50.49,98.6 51.69,97.4 54.51,97.4 54.66,97.54 54.66,98.35 v58.6,102.3
  Bottom 0.2: KIT1.P$9 103.62,112.62 81.75,112.62 81.12,112 81.12,110.38 78.75,108 77,108 76.55,108.45 76.55,109.23 76.23,109.55 68.66,109.55 67.05,107.95 66.66,107.55 64.05,104.95 63.66,104.55 60.17,104.55 59.85,104.23 59.85,103.55 v58.6,102.3
!RST!-KICK
  Bottom 0.3: KIT1.P$7 109.5,110.04 109.5,102 122,89.5 127,89.5 137.25,79.25 147.6,79.25 J4.4
!RST!-RADIO  (via drill 0.35)
  Top 0.2: KIT1.P$19 79.91,110.91 78.78,110.91 77.79,109.92 72.86,109.92 72.4,109.45 67.33,109.45 67.32,109.45 64.57,109.45 64.25,109.13 v64.25,106 | v68.5,99.9 67.75,99.15 J2.6
  3v3 0.2: v68.5,99.9 68.5,101.32 67.95,101.87 67.95,105.33 67.17,106.11 66.72,106.11 66.61,106 v64.25,106
+1.2V  (via drill 0.35, 0.75)
  Top 0.3: U1.80 69.27,70.25 69.77,69.75 v71.5,69.75 | U1.45 83.75,74.73 84,74.48 v84,74 | v74.5,56 73.5,56 73.25,55.75 U1.115 | v88,60.5 88.25,60.25 U1.9
  3v3 0.3: v70.5,12 73.9,15.4 74.25,15.4 83.53,24.68 83.53,25.87 90,32.35 v90,46
  5v 0.3: v75,62 75,56.5 v74.5,56 74.5,54.5 76,53 85.5,53 88,50.5 88,48 v90,46
  Bottom 0.152: F3.2 90,45.9 v90,46
  Bottom 0.3: v84,74 84,73.6 C19.1 82,71.6 82,68.5 81.5,68 75,68 | C6.1 74.75,56.25 v74.5,56 | 75,68 v75,62 85.35,62 C10.1 87.75,60.75 v88,60.5 | v71.5,69.75 72.15,69.75 C14.1 73.9,68 75,68
+1.2V-PRE
  Bottom 0.3: U7.2 U7.1 89.62,39.37 R32.1 90,39.55 C29.1
+2.5V  (via drill 0.35, 0.75)
  Top 0.3: U1.30 88.73,70.75 88.48,71 v88,71 | U1.65 73.75,74.25 v73.5,74 | U1.102 69.27,59.25 69.52,59 v71.5,59 | U1.137 84.25,55.4 83.65,56 v83.5,56
  3v3 0.3: v67.5,12 68.5,11 71,11 72,12 83,12 85,14 85,19.61 83.97,20.64 83.97,25 85.38,26.4 85.75,26.4 86.75,27.4 v86.75,28
  5v 0.3: v73.5,74 73.5,73 72.5,72 | 72.5,58 72.5,55.5 75.5,52.5 84.5,52.5 87,50 v87,47.5 | 72.5,58 72.5,64 | 72.5,64 72.5,72 | 72.5,58 v71.5,59 | 72.5,72 v71.5,72 | 72.5,64 82.5,64 | 82.5,64 86,64 | 86,64 89,64 92,61 v92,59 | 82.5,64 82.5,57 v83.5,56 | 86,64 86,69 v88,71
  Bottom 0.3: C15.1 87.6,71 v88,71 | C20.1 73.6,74 v73.5,74 73.35,73.85 73.35,72.23 73.12,72 v71.5,72 | C9.1 72.35,59 v71.5,59 | C4.1 83.5,56.65 v83.5,56 | v92,59 89.75,59 R10.2 | v86.75,28 86.75,28.25 94.5,36 94.5,43.2 90.2,47.5 v87,47.5 85.75,47.5 78.65,40.25 77,38.6 F4.2
+2.5V-PRE
  Bottom 0.3: U6.5 81.45,36.3 R33.1 C31.1
+3.3V  (via drill 0.35, 0.75)
  Top 0.2: J3.6 50.3,103.05 v50.3,103.08 | v48.6,107.6 47.72,107.6 U2.5
  Top 0.3: U1.100 70.25,60.25 v70.5,60 | U1.79 70.25,70.75 v70.5,71 | v87.9,69.75 U1.28 | v81.5,74 81.75,74.25 U1.49 | U1.42 85.25,74.25 v85,74 | 76,74 77.5,74 77.75,74.25 U1.57 | 76,74 v74.5,74 | U1.64 74.25,74.25 v74.5,74 | U1.62 75.25,74.23 75.02,74 v74.5,74 | v77,56 76.5,56 76.25,55.75 U1.121 | U1.138 84.75,55.4 85,55.65 v85,56 | U1.143 87.25,55.27 87,55.52 v87,56 | R7.2 89.75,92.85 | 89.75,92.85 R6.2 | U1.13 88.25,62.25 v88,62.5 | 89.75,92.85 89.75,93.25 v90,93.5 | 76,74 76.25,74.25 U1.60 | DD:U1.19 51.15,85 DD:C10.1 51.65,86 v50.5,86 | v40.5,76 40.5,77.1 40.9,77.5 DD:U1.45 | U2.5 46.55,107.55 v46.5,107.6 | D3.A v133.25,78.12 | D9.A v25,73 | D7.A 8.5,70 v9,70 | D8.A 20.81,31 v21,31 | D11.A 143.73,32 v144,32 | D10.A 149,73 v148,74
  Bottom 0.2: v50.3,103.08 50.3,105.9 v48.6,107.6
  Bottom 0.3: C16.1 72.5,71 v70.5,71 | v87.9,69.75 87.82,69.75 87,68.93 87,68.15 C13.1 87,67.85 v87,66.5 87,64.5 86.6,64.1 C12.1 87.5,63 v88,62.5 | C17.1 81,73.5 v81.5,74 | C21.1 85,72.65 v85,74 85,75.6 R12.1 | v74.5,74 75.5,74 76.65,72.85 C18.1 | C11.1 71.4,60 v70.5,60 | C7.1 v77,56 | C5.1 85,56.9 v85,56 | C8.1 87.5,56.5 v87,56 | X1.4 78.98,79.02 | 78.98,79.02 81.9,81.94 C22.1 | v78.5,84.5 78.71,84.29 X1.1 78.71,79.29 78.98,79.02 | U6.3 79.55,32.55 79.75,32.75 81.27,32.75 81.45,32.57 U6.1 82.14,31 82.61,31 83.45,31.84 83.45,32 | v40.5,76 40.4,75.9 DD:C1.1 40.4,72.4 v40,72 | DD:R1.1 50.5,84.6 v50.5,86 | IC1.9 44.23,98.17 43.05,97 | IC1.18 38.38,97 43.05,97 | 43.05,97 41.02,94.97 | 41.02,94.97 40.98,94.92 IC1.15 | 41.02,94.97 41.02,93.05 41.7,92.38 C23.1 42.88,91.38 v42.9,91.4 | R31.1 v70.5,9.75 | U7.4 88.91,34.81 88.87,34.81 88.69,34.99 88.69,37.02 87.81,37.91 86,37.91 | U7.8 86,37.91 | 86,37.91 86,37.71 85.56,37.27 85.56,36.51 84.97,35.92 83.63,35.92 83.45,35.74 83.45,32 | v133.25,78.12 134.18,77.2 J4.2 | 83.45,32 v85,32
  other vias: 62,26 62.5,25.5 63,25 61.5,25.5 61,25
  pour 3v3 (isolate 0.4, rank 2, no thermals): 34.98,117.25 6.54,89.71 -1,71.92 -1,23 38,-16 122,-16 159,21 159,72.76 152.46,88.54 123.75,117.25
  pour Bottom (no thermals): 62.12,23.38 60.5,25 62,26.5 63.62,24.88
+3.3V-FUSE
  Bottom 0.3: R25.2 53.75,8.9 53.75,12.38 54.38,13 U4.789
  pour Bottom (no thermals): 54.75,12.75 56.75,12.75 56.75,14.62 56.75,14.75 57.25,15.25 57.25,18.12 58.12,19 57,20.12 54.75,17.88
+5V  (via drill 0.35, 0.75)
  Top 0.2: J2.1 63.1,94.9 v63.1,93.1
  Top 0.3: v101,92 100.25,92.75 R3.1
  Top 0.5: J1.8 69.5,101.5 v70,101 | LED1.1 47.95,116 v48,116 | LED2.1 53.8,116 v54,116 | LED3.1 59.45,116 v60,116
  Bottom 0.3: v70.5,7.5 71.9,7.5 R30.1 | M2:J1.5 35.72,14.68 34.8,15.6 33.18,15.6 33,15.42 32.18,15.42 29.81,17.8 29.81,19.19 M2:U2.9
  Bottom 0.5: M1:J1.5 16.8,42.2 v17,42 | M3:J1.5 116.32,13.68 v117,13 | M4:J1.5 146,47.7 v146,47.09
  Bottom 0.7: R27.2 70.15,37.35 v70.12,37.38
  pour 5v (no thermals): 34.88,117 7.27,90.12 0,72.89 0,21.28 35.51,-14.6 123.35,-15.52 158.05,18.75 157.77,74.5 151.18,89.95 123.25,117
+5V-FUSE
  pour Bottom (no thermals): 70.5,25 70.5,22.75 72.75,22.75 72.75,25 72.5,25.5 72.5,30 71,30 71,25.5
  pour Bottom (no thermals): 72.5,30 72.5,28 70.5,28 70.5,32.5 72.5,32.5
+18.5
  pour Bottom (no thermals): 45.7,41 58.9,27.8 58.9,27.7 55.5,24.3 42.2,37.6 45.6,41
+18.5V  (via drill 0.35, 0.75)
  Top 0.3: R8.1 82.72,42.62 v82.72,41.98 | R1.1 109.25,90.25 v109,90 | DD:U1.25 v41,88.25 | M1:U1.25 v39,63.75 | M4:U1.25 v120.1,60.5 | M2:U1.25 52.34,38.66 v52,39 | M3:U1.25 103,34.12 v103,34
  3v3 0.3: v109,90 109,86 114.5,80.5 M3:C13.1 | v82.72,41.98 82.72,33.07 81.9,32.25 81.9,29.04 80.05,27.19 80.05,24.7 68.21,12.86 67.14,12.86 66.64,12.36 66.64,11.64 69.39,8.89 70.33,8.89 71.36,7.86 71.36,5.86 v70.5,5
  Bottom 0.3: R29.2 v70.5,5 70,5 68.75,6.25 68.75,22.25 M3:C12.1 | v41,88.25 38.75,90.5 34.5,90.5 33,89 DD:Q5.5678 | v39,63.75 37.25,65.5 32.5,65.5 31.25,64.25 M1:Q5.5678 | v120.1,60.5 124.5,60.5 127.25,63.25 M4:Q3.5678 | U4.16 61.1,11.75 C25.1 | v103,34 107.16,29.84 M3:Q5.5678
  Bottom 0.5: M3:Q1.5678 122.97,39.03 v123,39 | M2:Q3.5678 52,34.1 v52,39 | v52,39 50.96,39 50.26,39.7 47.45,39.7 M2:Q5.5678 | M2:Q1.5678 55.59,32.45 56.42,33.28 56.42,34.58 v52,39
  other vias: 126,76.5 127,76.5 128,76.5 129,76.5 129,75.5 128,75.5 127,75.5 126,75.5 126,74.5 127,74.5 128,74.5 129,74.5 28.5,71.5 29.5,71.5 30.5,71.5 31.5,71.5 28.5,70.5 29.5,70.5 30.5,70.5 31.5,70.5 28.5,69.5 29.5,69.5 30.5,69.5 31.5,69.5 87.5,18 88.5,18 87.5,17 88.5,17 87.5,16 86.5,18 86.5,17 86.5,16 88.5,16 63,12 63,13.5 63,12.75
  pour Bottom (no thermals): 74.75,22.4 78.5,22.4 78.5,23 80,23 80,22.1 74.75,22.1
  pour Bottom (no thermals): 125,77 125,54.5 130,54.5 130,77
  pour Bottom (no thermals): 28,72 28,49 33,49 33,71.5 35,73.5 35,74 35,91 30,91 30,74
  pour Vbatt (no thermals): 13,96 25.5,96 26,96.5 37,96.5 43,90.5 43,74 44.5,72.5 56,72.5 57,71.5 57,66 56,65 46,65 40.5,59.5 40.5,49.5 41,49 43,49 63.5,28.5 87,28.5 97,18.5 106.5,18.5 111.5,23.5 111.5,24 104.25,31.25 113.5,40.5 113.5,45 105.5,53 105.5,57.5 114,66 114,84 150.69,84 156.28,70.51 158.49,48 157.22,22.04 154.18,15.18 124,-15 37,-15 2,20 2,85
  pour Bottom (no thermals): 78.5,24.5 78.5,22 79.5,22 80.65,20.5 80.65,17.5 82.88,15.5 90,15.5 90,19 83,19 82.5,19.5 82.5,23.5 81.5,24.5
  pour Bottom (no thermals): 104,30 107.5,26.5 120,39 116.5,42.5
  pour Bottom (no thermals): 61,12.75 62.5,12.75 62.5,13.88 63.5,13.88 63.5,11.62 61,11.62
AAM
  Bottom 0.2: R17.2 75.3,19.04 75.3,21.1 U3.18
AAM1
  Bottom 0.3: U4.18 61.6,10.75 R18.2
BATT-FPGA
  Top 0.3: U1.136 83.75,52.25 87.75,48.25 87.75,47.1 C3.1 | C3.1 R9.1 | C3.1 R8.2
BOLT1  (via drill 3.8 pad 7.2)
  other vias: 22,98.94
BOLT2  (via drill 3.8 pad 7.2)
  other vias: 136,98.94
BOLT4  (via drill 3.8 pad 7.2)
  other vias: 30.5,42.94
BYP
  Bottom 0.3: U7.3 90.34,36.08 90.37,36.08 92,37.71 C30.1
DD-!CS
  Top 0.3: RN6.11 62.65,69.5 58.12,69.5 50.12,77.5 DD:U1.4
DD-!FAULT!  (via drill 0.35)
  Top 0.3: DD:U1.2 49.3,76.45 50.15,76.45 50.33,76.27 50.33,75.73 50,75.4 v50,75
  Bottom 0.3: v50,75 50,74.95 Q3.1
DD-A-H
  Top 0.3: RN6.9 54.5,79.25 54.5,81 53.5,82 DD:U1.13
DD-A-L
  Top 0.3: RN8.16 62.38,72.45 55.45,79.38 55.45,81.19 54.14,82.5 DD:U1.14
DD-B-H
  Top 0.3: RN8.15 62.38,73.25 56.4,79.23 56.4,81.37 54.77,83 DD:U1.15
DD-B-L
  Top 0.3: RN8.14 62.38,74.05 57,79.43 57,82 55.5,83.5 DD:U1.16
DD-C-H
  Top 0.3: RN8.13 62.38,74.85 57.95,79.28 57.95,82.19 56.14,84 DD:U1.17
DD-C-L
  Top 0.3: RN8.12 62.38,75.65 58.9,79.13 58.9,82.37 56.77,84.5 DD:U1.18
DD-H1
  Top 0.3: RN8.11 62.38,76.45 59.5,79.33 59.5,84.5 54.5,89.5 40,89.5 37,92.5 25.35,92.5 20.85,88 DD:J1.3
DD-H2
  Top 0.3: RN8.10 62.38,77.25 60.5,79.13 60.5,84.5 55.02,89.98 40.52,89.98 37.5,93 24.98,92.98 22,90 DD:J1.2
DD-H3
  Top 0.3: RN8.9 61.5,79.25 61.5,84.5 55.57,90.43 41.07,90.43 38,93.5 24.79,93.43 23.36,92 DD:J1.1
DD:AVDD
  Top 0.3: DD:C2.1 50.9,87 DD:U1.23
DD:BST-A
  Top 0.3: DD:C6.1 37,72.5 39.5,75 39.5,77 40.5,78 DD:U1.44
DD:BST-B
  Top 0.3: DD:C7.1 36.75,79.25 38,80.5 DD:U1.39
DD:BST-C
  Top 0.3: DD:U1.34 39.64,83 37.78,84.85 36.65,84.85 35.75,85.75 DD:C8.1
DD:CP1
  Top 0.3: DD:C3.1 51.15,80.5 DD:U1.10
DD:CP2
  Top 0.3: DD:C3.2 52.15,81 DD:U1.11
DD:EN-GATE  (via drill 0.35)
  Top 0.3: DD:U1.12 v48,81.5
  Bottom 0.3: DD:R1.2 48,83.1 v48,81.5
DD:GH-A  (via drill 0.35)
  Top 0.3: DD:U1.43 40,78.5 v38.5,77
  5v 0.3: v38.5,77 37.5,78 28.5,78 v27.5,79
  Bottom 0.3: v27.5,79 28.23,78.27 DD:Q1.4
DD:GH-B  (via drill 0.35)
  Top 0.3: v38,81.1 38,81 DD:U1.38
  5v 0.3: v38,81.1 38,83 37,84 29,84 v27.5,85.5
  Bottom 0.3: v27.5,85.5 27.5,85.13 DD:Q3.4
DD:GH-C  (via drill 0.35)
  Top 0.3: v37,85.47 38,85.47 39.98,83.5 DD:U1.33
  5v 0.3: v37,85.47 34.18,85.47 v28,91.66
  Bottom 0.3: v28,91.66 28.23,91.42 DD:Q5.4
DD:GL-A
  Top 0.3: DD:U1.41 38,79.5 36.41,77.91 DD:Q2.4
DD:GL-B
  Top 0.3: DD:U1.36 40,82 37.59,84.41 DD:Q4.4
DD:GL-C
  Top 0.3: DD:U1.31 40.5,84.5 39.1,85.9 39.1,89.4 37.59,90.91 DD:Q6.4
DD:GVDD  (via drill 0.35)
  Top 0.3: DD:U1.9 49.3,79.95 50.15,79.95 50.22,79.88 v50.62,79.88
  Bottom 0.3: v50.62,79.88 49.15,81.35 DD:C9.1
DD:PHASE-A  (via drill 0.35)
  Top 0.3: DD:C6.2 31.5,72.5 31,73 31,74.93 DD:Q2.5678 29.93,76.07 29.5,76.5 v29.5,79 | DD:U1.42 38.86,79 38.5,78.64 v38.5,78.5
  Top 1.27: DD:J1.8 24.5,78 26.5,76 DD:Q2.5678
  3v3 0.3: v38.5,78.5 38,79 v29.5,79
  Bottom 1.27: DD:J1.8 24,78 24.5,77.5 24.5,76.5 25.63,75.37 DD:Q1.2
  pour Bottom (no thermals): 27.5,77 29,77 29,73.75 27.5,73.75
DD:PHASE-B  (via drill 0.35)
  Top 0.3: DD:C7.2 31.25,79.25 31,79.5 31,81.5 30,82.5 DD:Q4.5678 29.5,82.93 v29.5,85.5 | DD:U1.37 39.5,81.5 v39,82
  Top 1.27: DD:J1.7 23.5,80 26,82.5 DD:Q4.5678
  3v3 0.3: v29.5,85.5 35.5,85.5 v39,82
  Bottom 1.27: DD:J1.7 24.5,80 26.5,82 28.09,82 DD:Q3.2
  pour Bottom (no thermals): 27.5,83.5 29,83.5 29,80.25 27.5,80.25
DD:PHASE-C  (via drill 0.35)
  Top 0.3: DD:U1.32 40.11,84 38.5,85.61 v38.5,86.5 | DD:C8.2 31.25,85.75 31,86 31,87 31,87.5 31,87.93 DD:Q6.5678 29.5,89.43 v29.5,91.75
  Top 1.27: DD:J1.6 21,82 25,86 25,88 26,89 DD:Q6.5678
  3v3 0.3: v38.5,86.5 37.5,87.5 37.5,90.12 35.88,91.75 v29.5,91.75
  Bottom 1.27: DD:J1.6 23,82 24.5,83.5 24.5,87 25.87,88.37 DD:Q5.2
  pour Bottom (no thermals): 29,90 29,86.75 27.5,86.75 27.5,90
DOT-CLK-1
  Top 0.2: U2.4 52.1,107.55 R13.2
  Top 0.3: U2.4 48.12,109 46.98,109 45.25,110.73 LED1.5
DOT-CLK-1-2
  Top 0.2: LED1.2 46.15,114.1 46.15,113.9 47.45,112.6 49.7,112.6 50.2,112.1 50.2,111.9 LED2.5
DOT-CLK-2-3
  Top 0.2: LED2.2 52,114.1 52,113.9 53.3,112.6 55.35,112.6 55.85,112.1 55.85,111.9 LED3.5
DOT-MOSI-1-2
  Top 0.2: LED1.3 44.45,114.1 44.45,113.9 46.1,112.25 47.6,112.25 48.85,111 LED2.4
DOT-MOSI-2-3
  Top 0.2: LED2.3 50.3,114.1 50.3,113.9 51.95,112.25 53.45,112.25 54.7,111 LED3.4
EN
  Bottom 0.2: U3.17 75.78,21.75 76.78,20.75 R16.2
  Bottom 0.3: C26.1 R16.2
EN1
  Bottom 0.3: U4.17 63.6,11.25 R19.2
EN-PWR  (via drill 0.35)
  Top 0.3: S2.3 142,90.97 141.16,90.13 141.16,82.84 156,68 156,39 118.93,1.93 84.44,1.93 80.37,6 80.37,14.97 v80.4,15 | U8.4 v78,44 | v78,26 v78,16
  5v 0.3: v67.5,15.5 v70,15.5
  Bottom 0.3: R16.1 80,19.75 80,17.1 79,16 v78,16 | R19.1 66.15,15.5 v67.5,15.5 | v70,15.5 70.5,15 77,15 v78,16 | v80.4,15 79,15 v78,16 | v78,26 78,33.22 75.94,35.28 75.94,38.71 78,40.77 v78,44
EN-PWR-PRE  (via drill 0.35)
  Top 0.3: v82.8,27.5 82.8,25.3 79.8,22.3 79.8,5.34 83.67,1.48 119.11,1.48 157,39.36 157,70.46 156.45,71.01 156.23,71.23 142,85.46 S2.2
  Bottom 0.3: R15.2 84.25,28.15 84.25,28 | 84.25,28 R14.1 | 84.25,28 83.75,27.5 v82.8,27.5
EXTRA-IND  (via drill 0.35)
  Top 0.3: R5.1 106.7,81.7 v109.58,84.58
  Bottom 0.3: v109.58,84.58 109.58,85.75 111.45,87.63 111.45,97.16 KIT1.P$12
FB
  Bottom 0.2: U3.1 74.55,20.2 R24.2
  Bottom 0.3: R24.2 72.85,17.35 72.5,17 70,17 69.5,17.5 69.5,26.1 R23.1
FB1
  Bottom 0.3: U4.1 58.55,8.4 R26.2 R25.1
FPGA-CLK  (via drill 0.35)
  Top 0.3: v81.5,78.5 81.25,78.25 U1.50
  Bottom 0.3: X1.3 83.54,78.5 v81.5,78.5
FPGA-DONE  (via drill 0.35)
  Top 0.3: KIT1.P$15 90.07,105.43 87.82,103.18 87.82,98.09 86.35,96.62 86.35,92.49 83.68,89.82 82.57,89.82 81.25,88.5 81.25,86.35 76.4,81.5 v75.5,81.5 | v69.5,75.5 69.6,75.6 U1.72
  Bottom 0.3: R11.1 68.4,75.5 v69.5,75.5 v75.5,81.5
FPGA-INIT  (via drill 0.35)
  Top 0.3: U1.40 86.25,74.25 v86.5,74 | v88,82 85,82 83.88,83.12 83.88,89.38 86.8,92.3 86.8,96.44 88.47,98.1 88.47,103.03 92.61,107.18 KIT1.P$14
  Bottom 0.3: v86.5,74 86.85,74.35 R12.2 88,76.9 v88,82
FPGA-PROG  (via drill 0.35)
  Top 0.3: U1.1 90,55.85 v90,55.5 | KIT1.P$13 95.15,109.03 89.06,102.94 89.06,98.06 87.25,96.25 87.25,89.75 86.31,88.81 86.31,85.19 v89,82.5
  Bottom 0.3: R10.1 90,56.9 v90,55.5 90.5,55.5 93,58 93,59.5 90,62.5 90,81.5 v89,82.5
GND  (via drill 0.35, 1.02)
  Top 0.2: J2.2 64.59,99.15 v64.75,99 | U8.7 75.4,42.6 v74.6,42.6